# Altium PCB iMX6 Rex Development Baseboard V1I1_PCB.PcbDoc (part 1 of 6)
Units mm, origin at the board's own origin, x right, y up, seen from the top; angles counter-clockwise.
Board outline 135 x 110 mm, 6 copper layers (L1, L2, L3, L4 (PWR), L5, L6), stack 1.542 mm thick; 580 components, 458 nets, 2100 pads, 1201 vias.
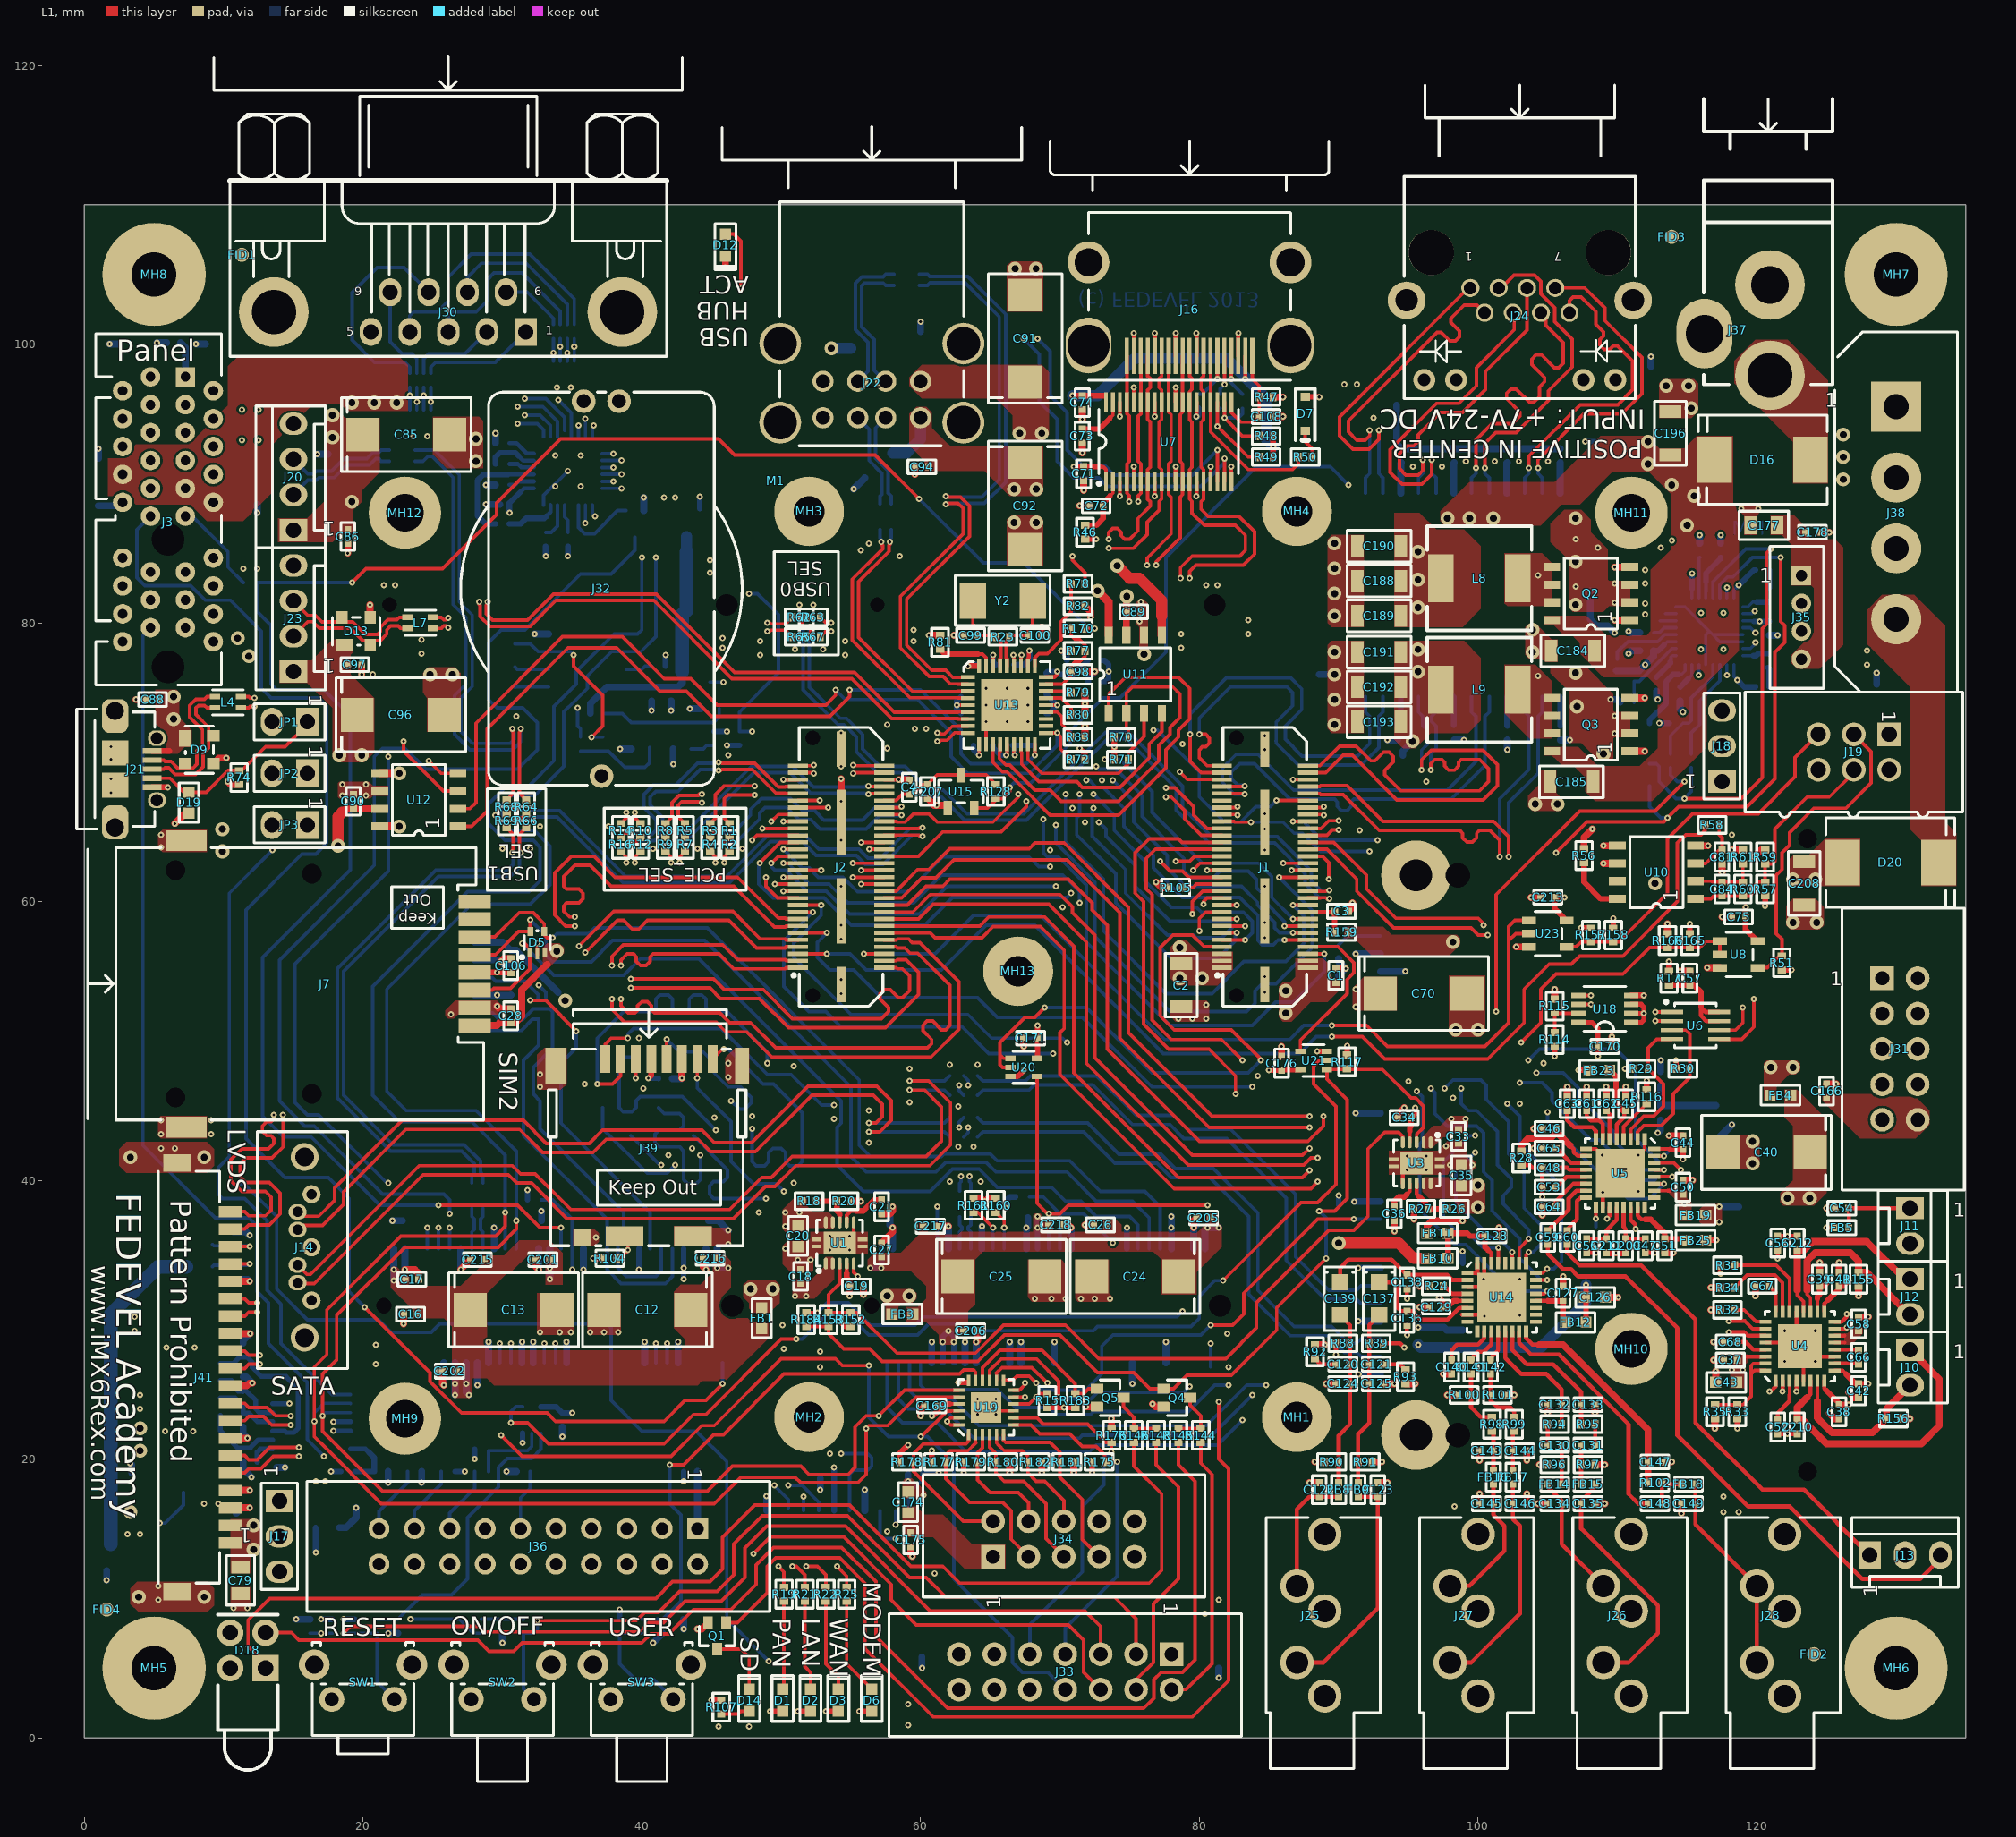
[diagram p0: L1 view]
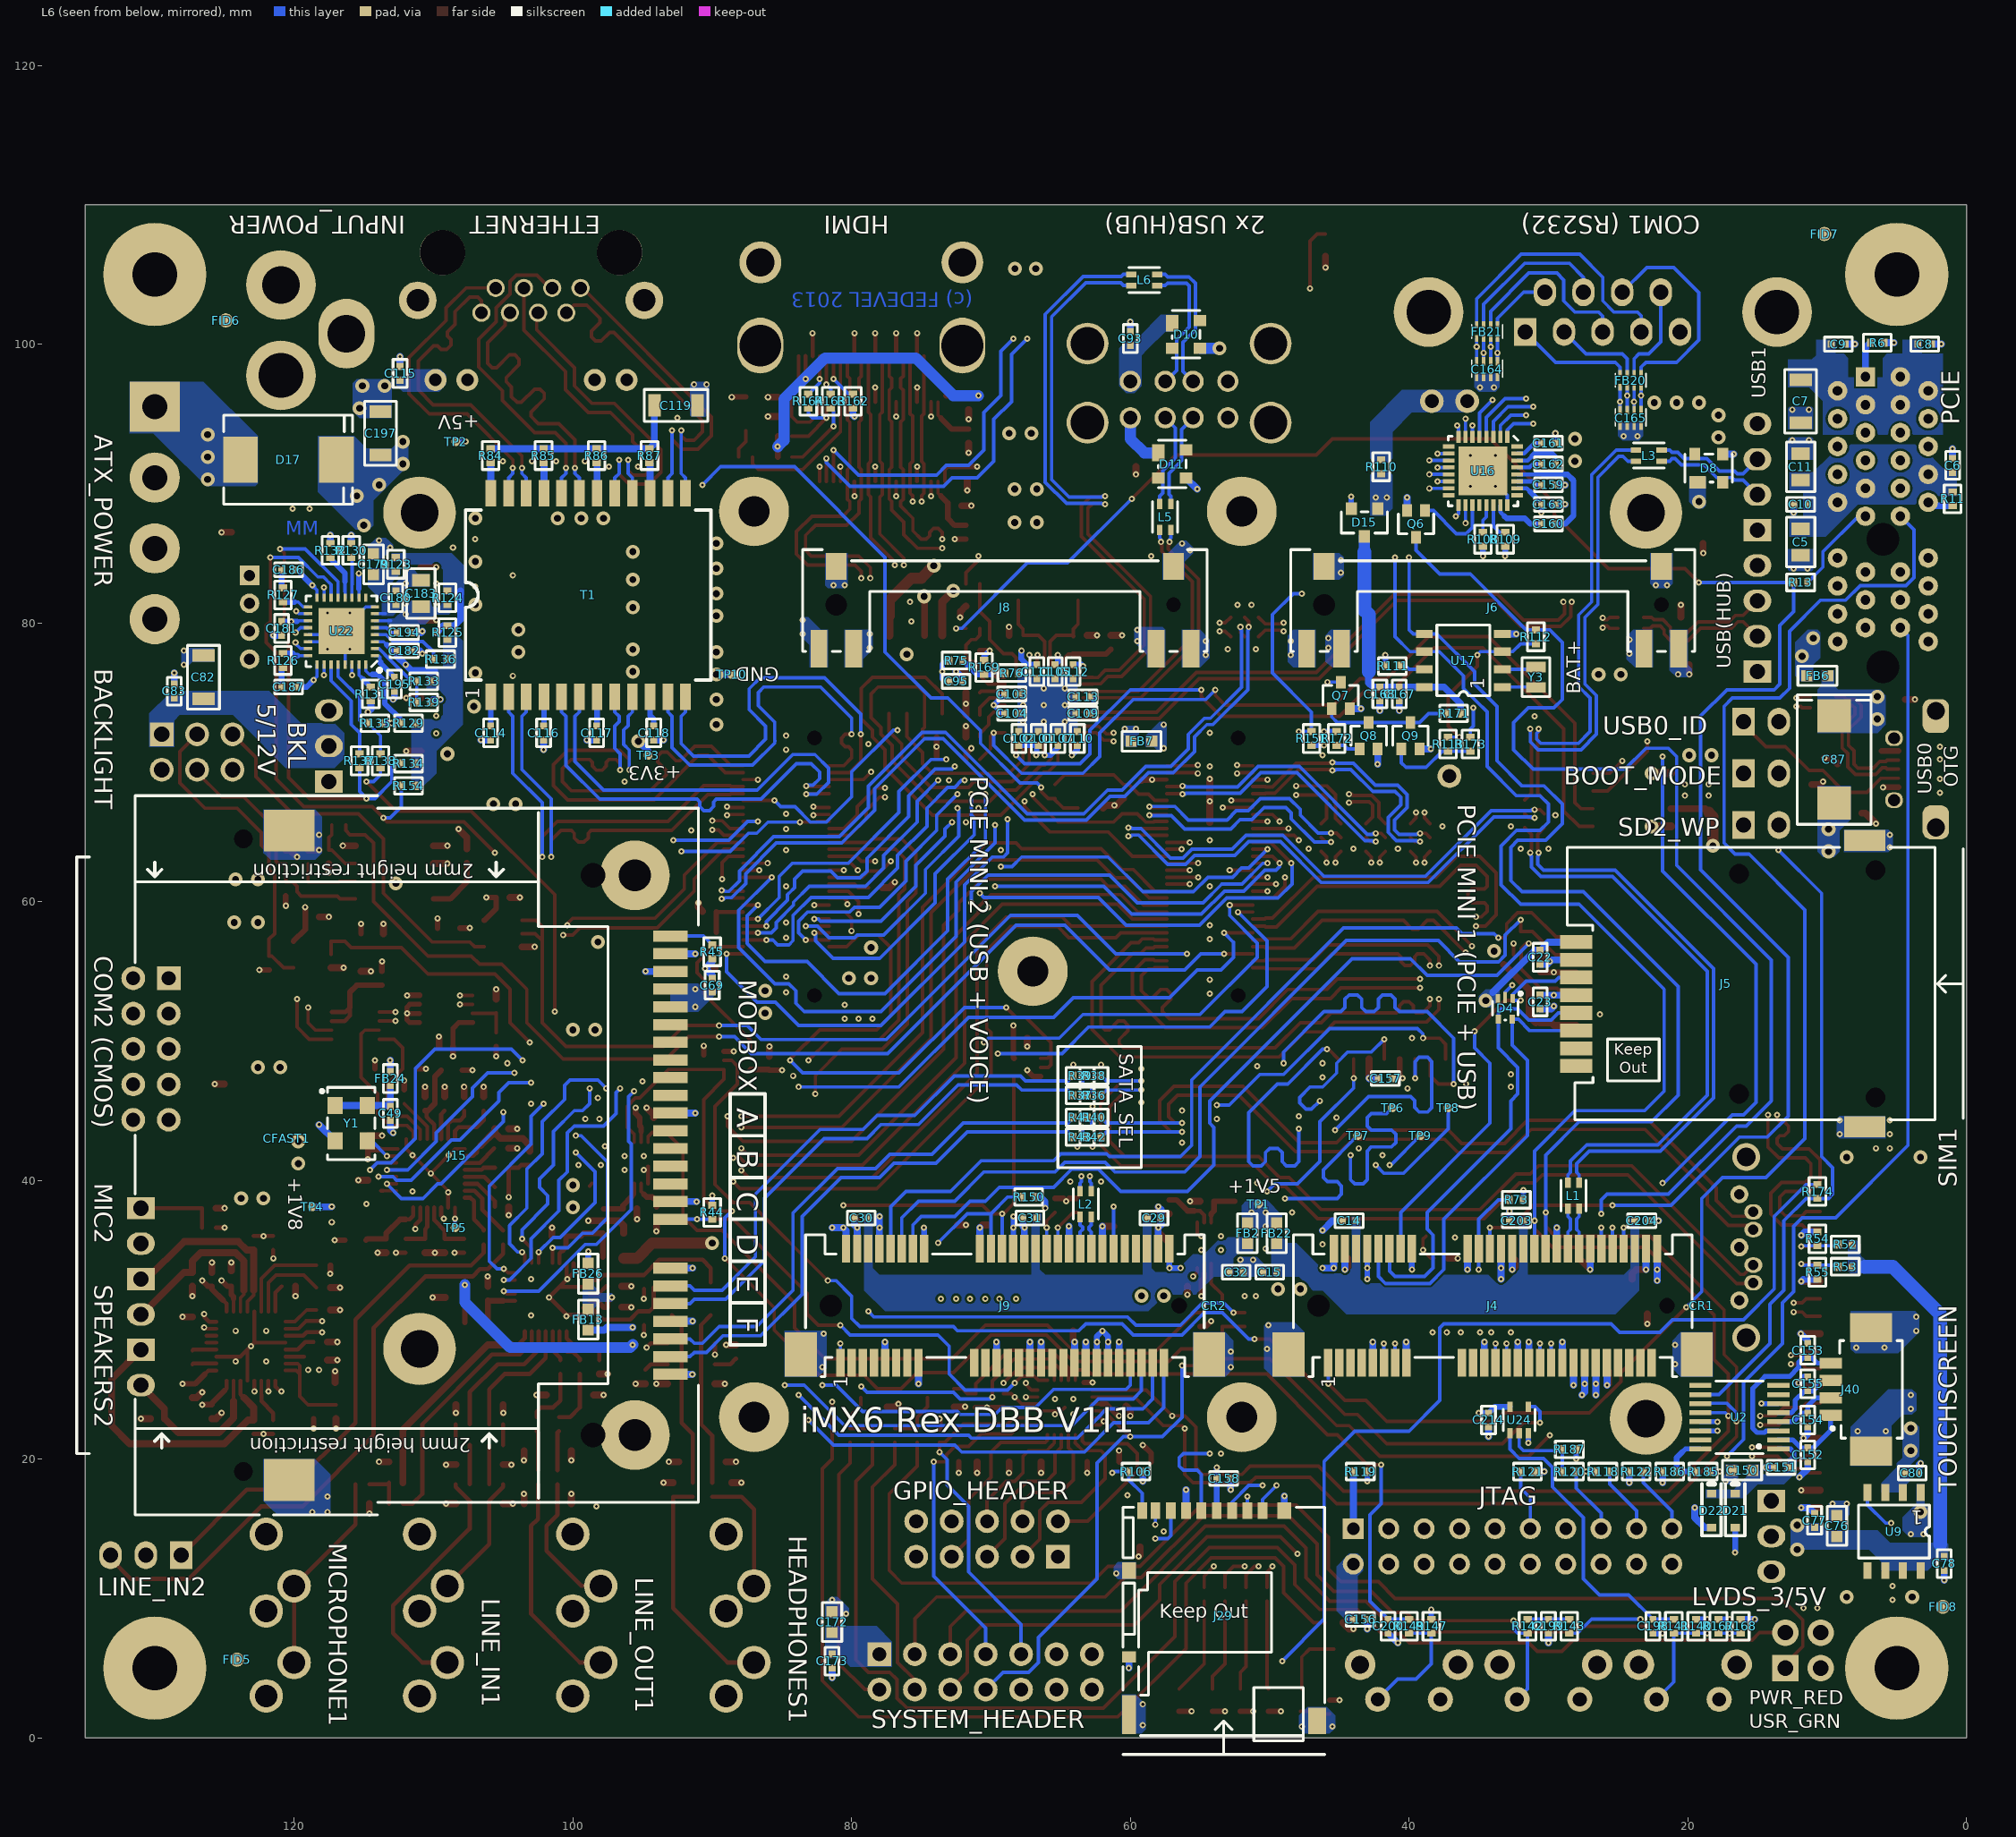
[diagram p1: L6 view, seen from below]
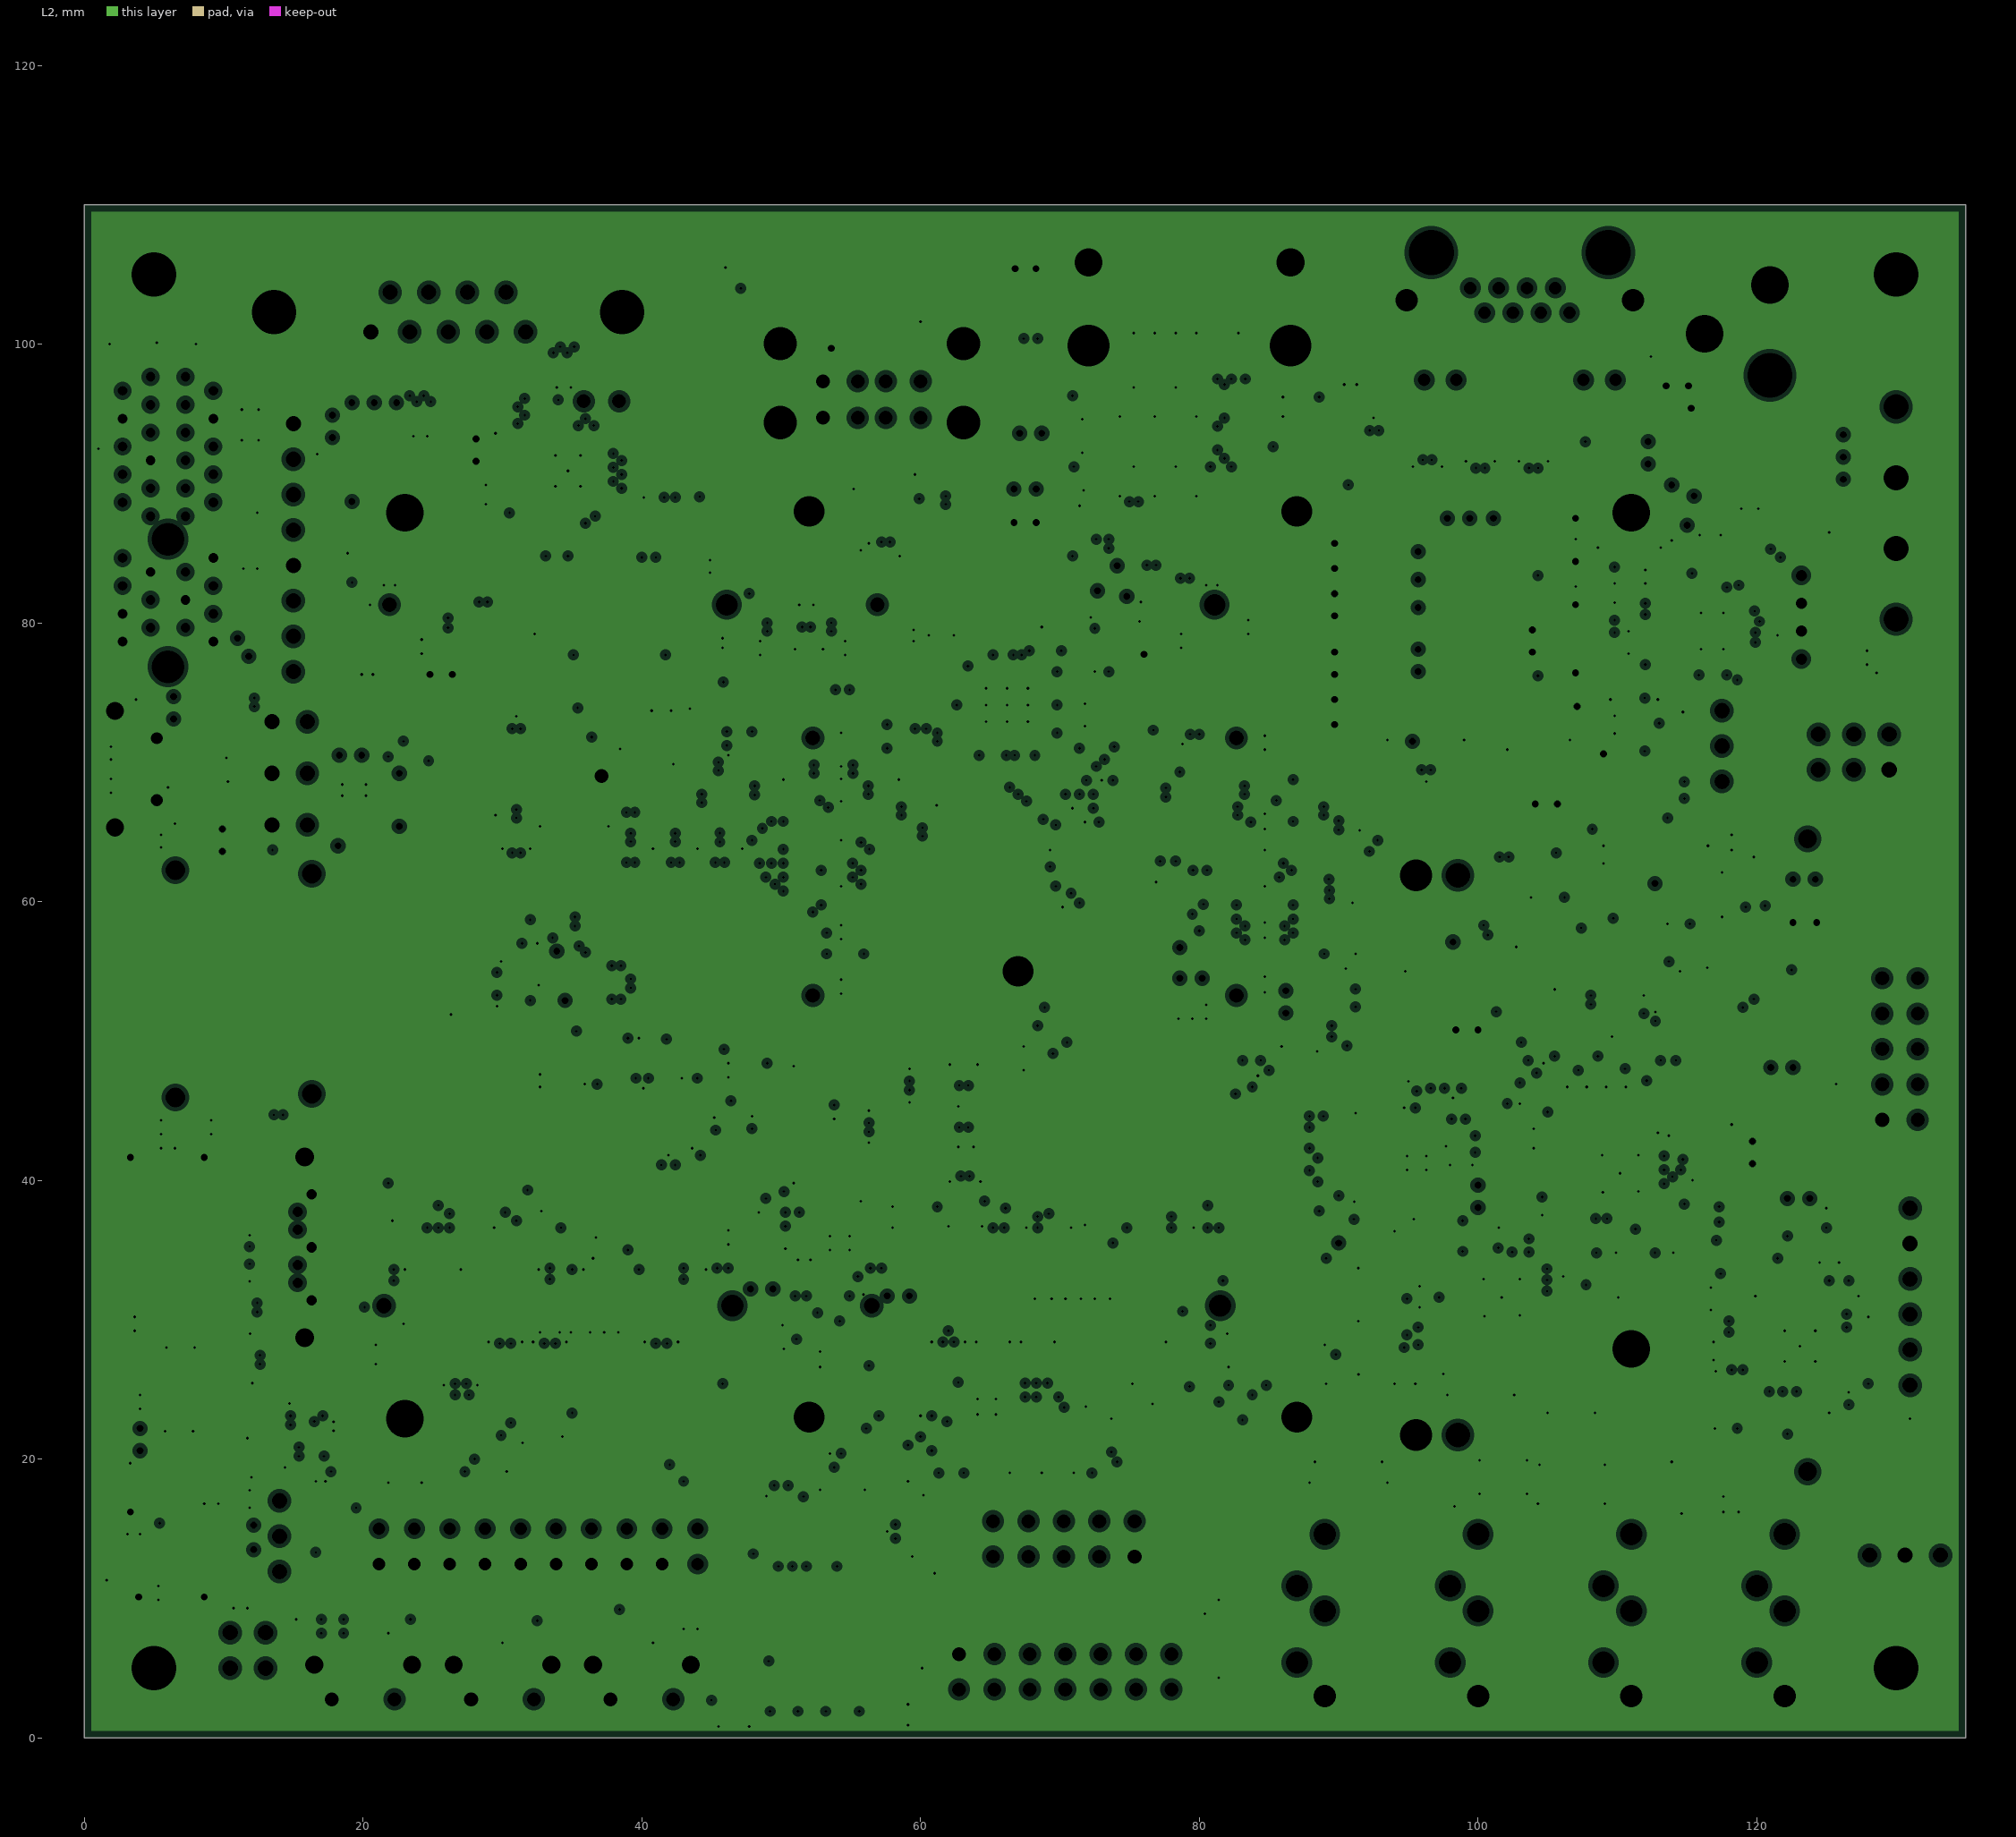
[diagram p2: L2, clearances drawn from the general rule]
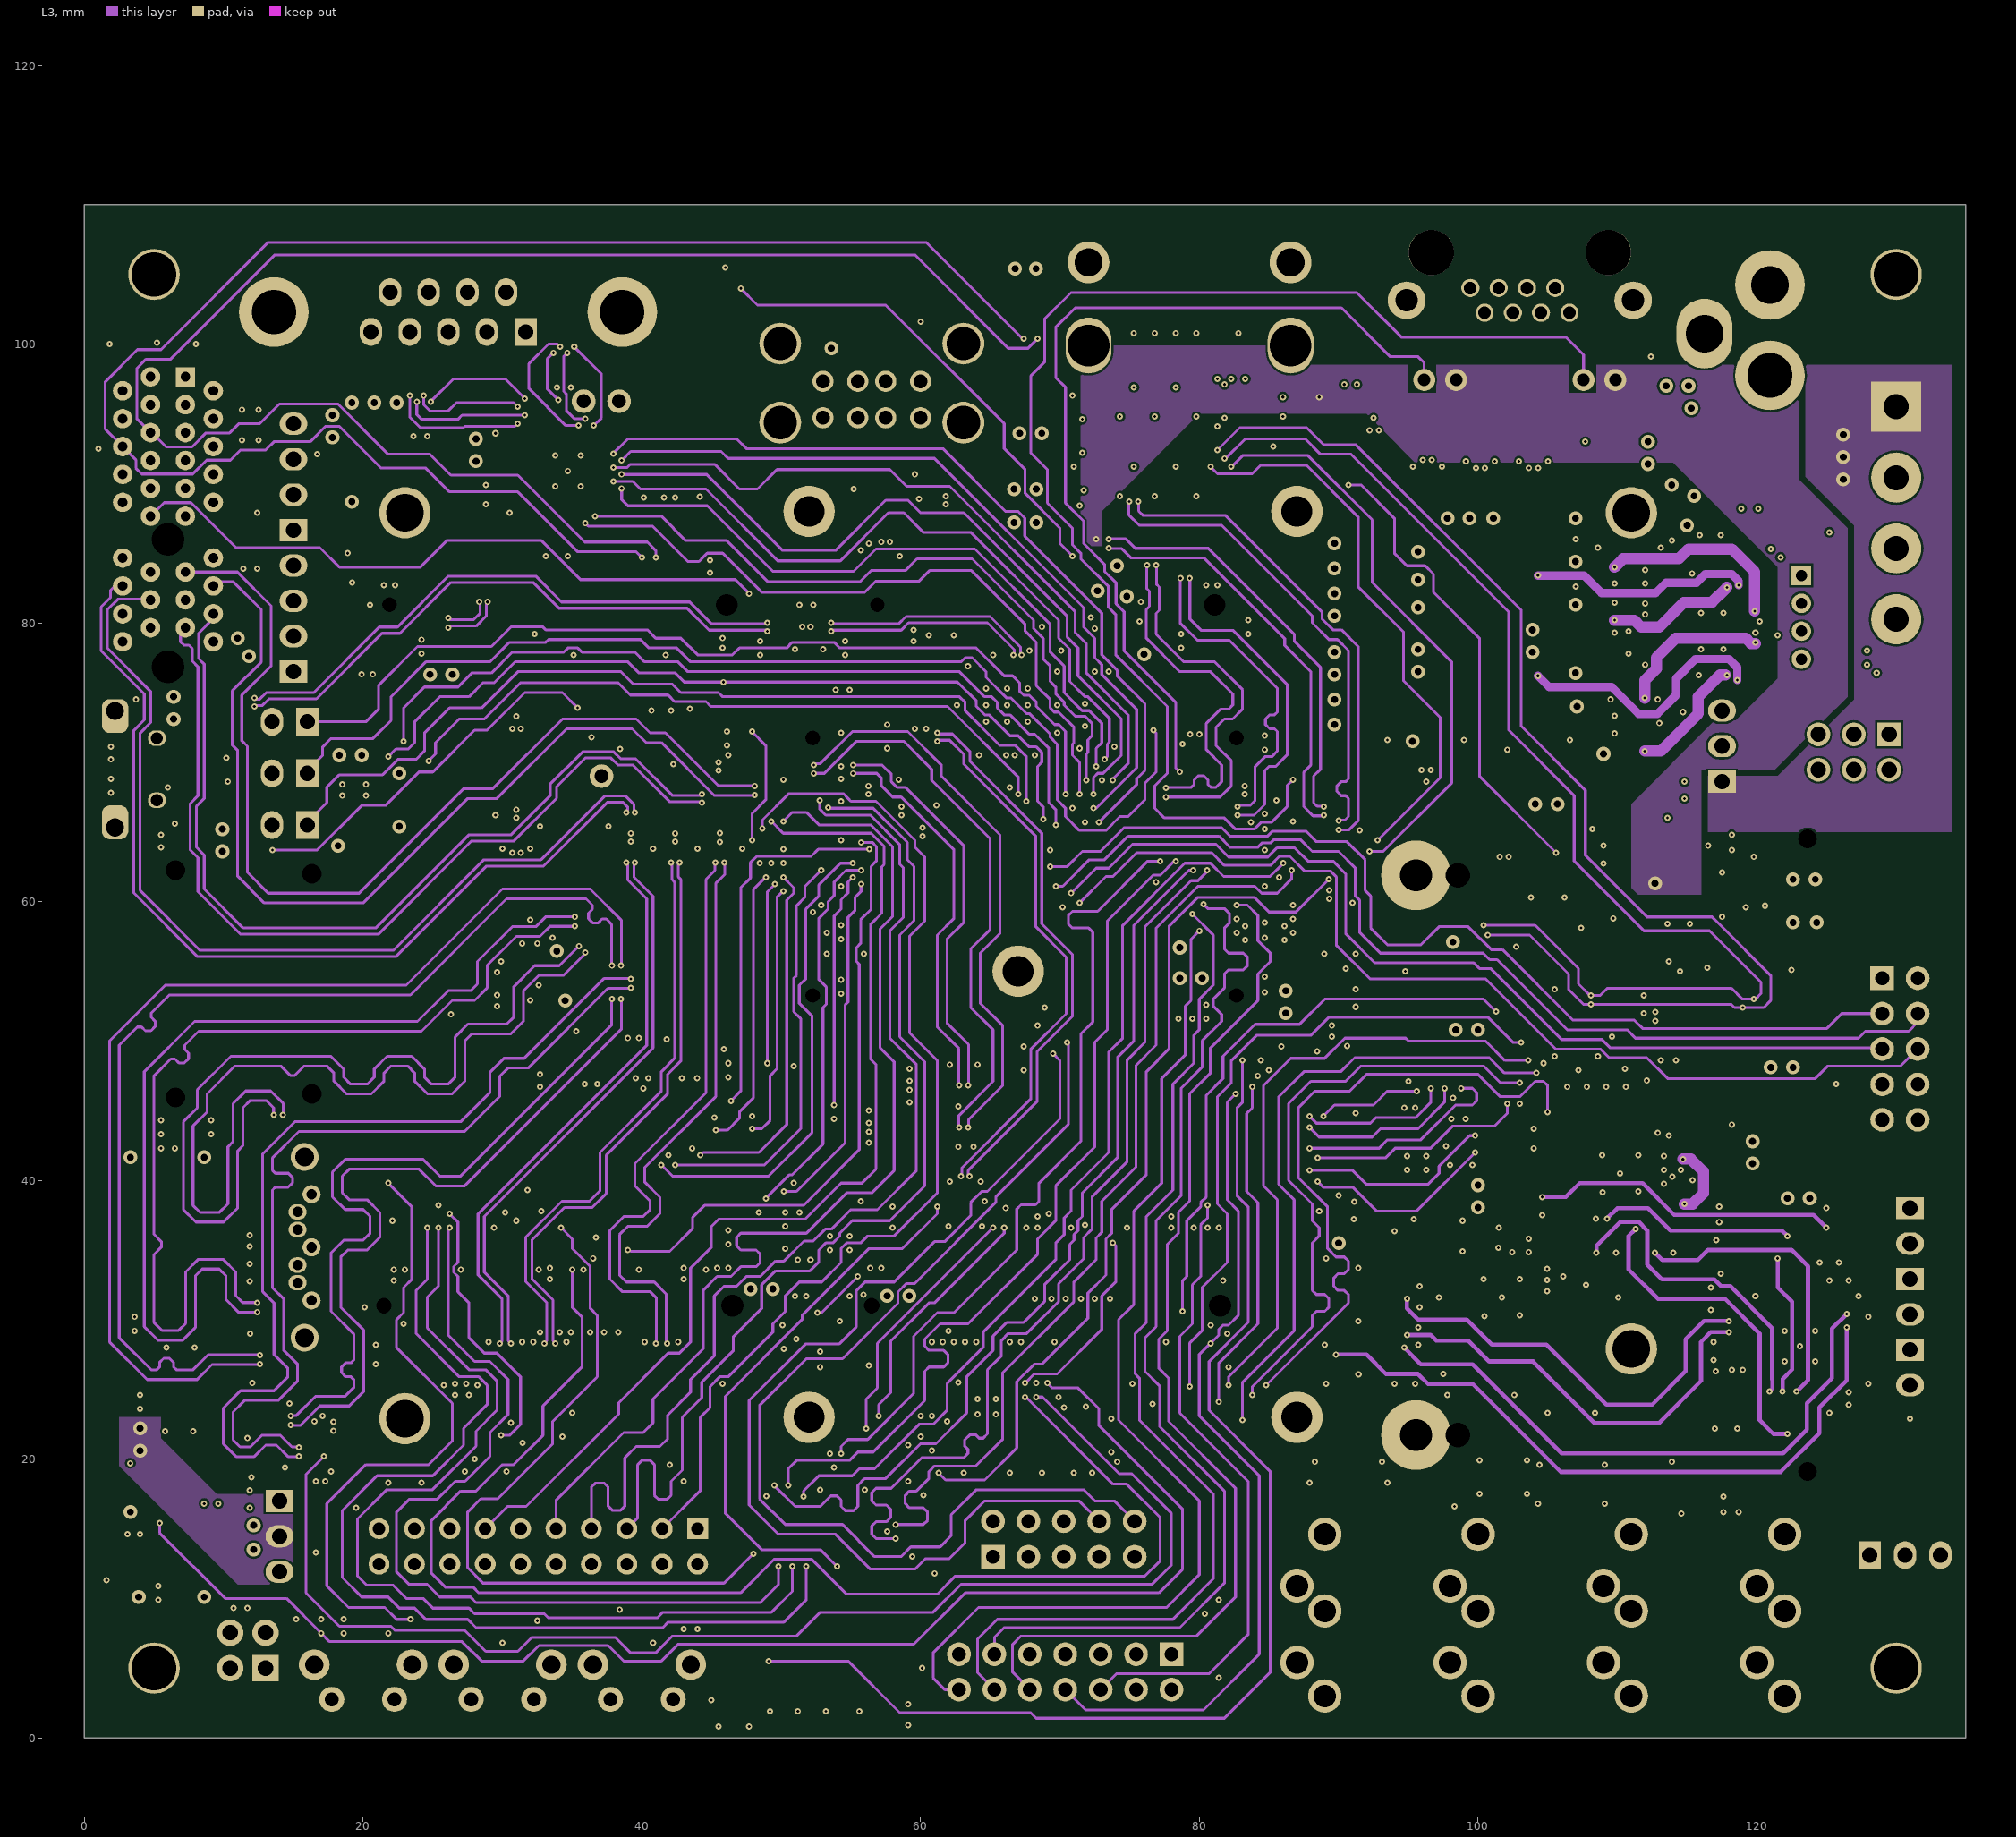
[diagram p3: L3]
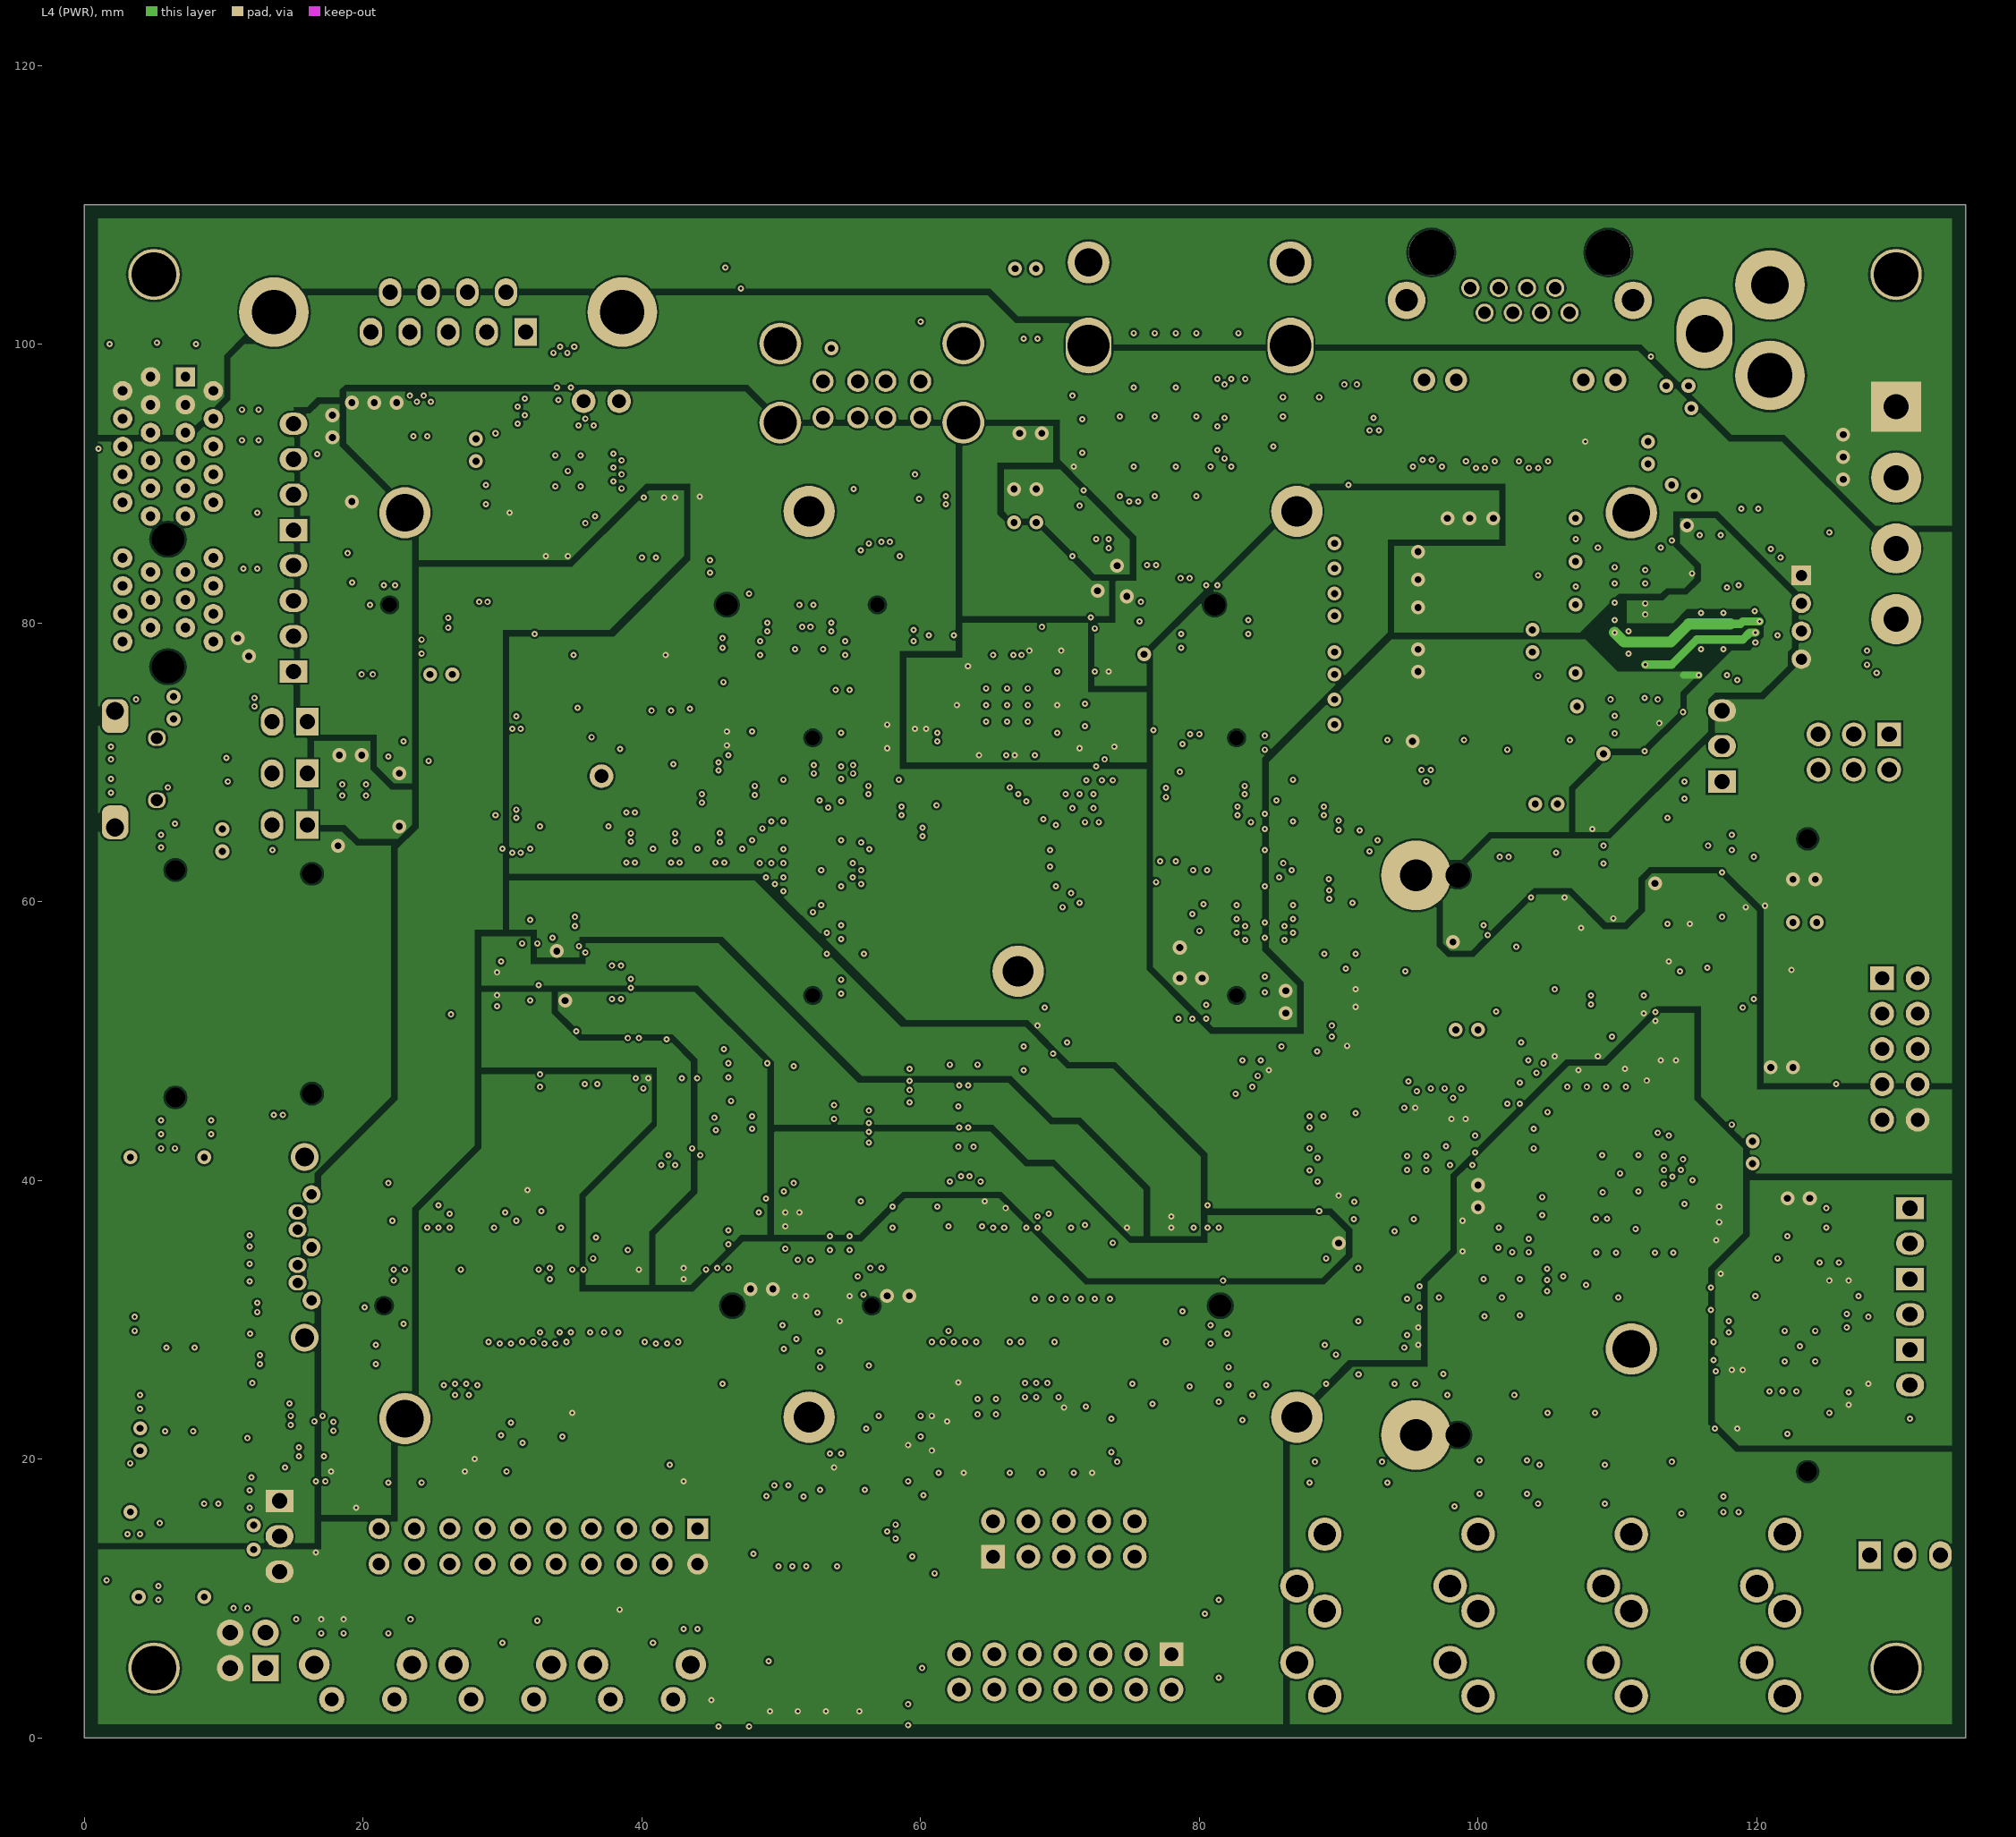
[diagram p4: L4 (PWR)]
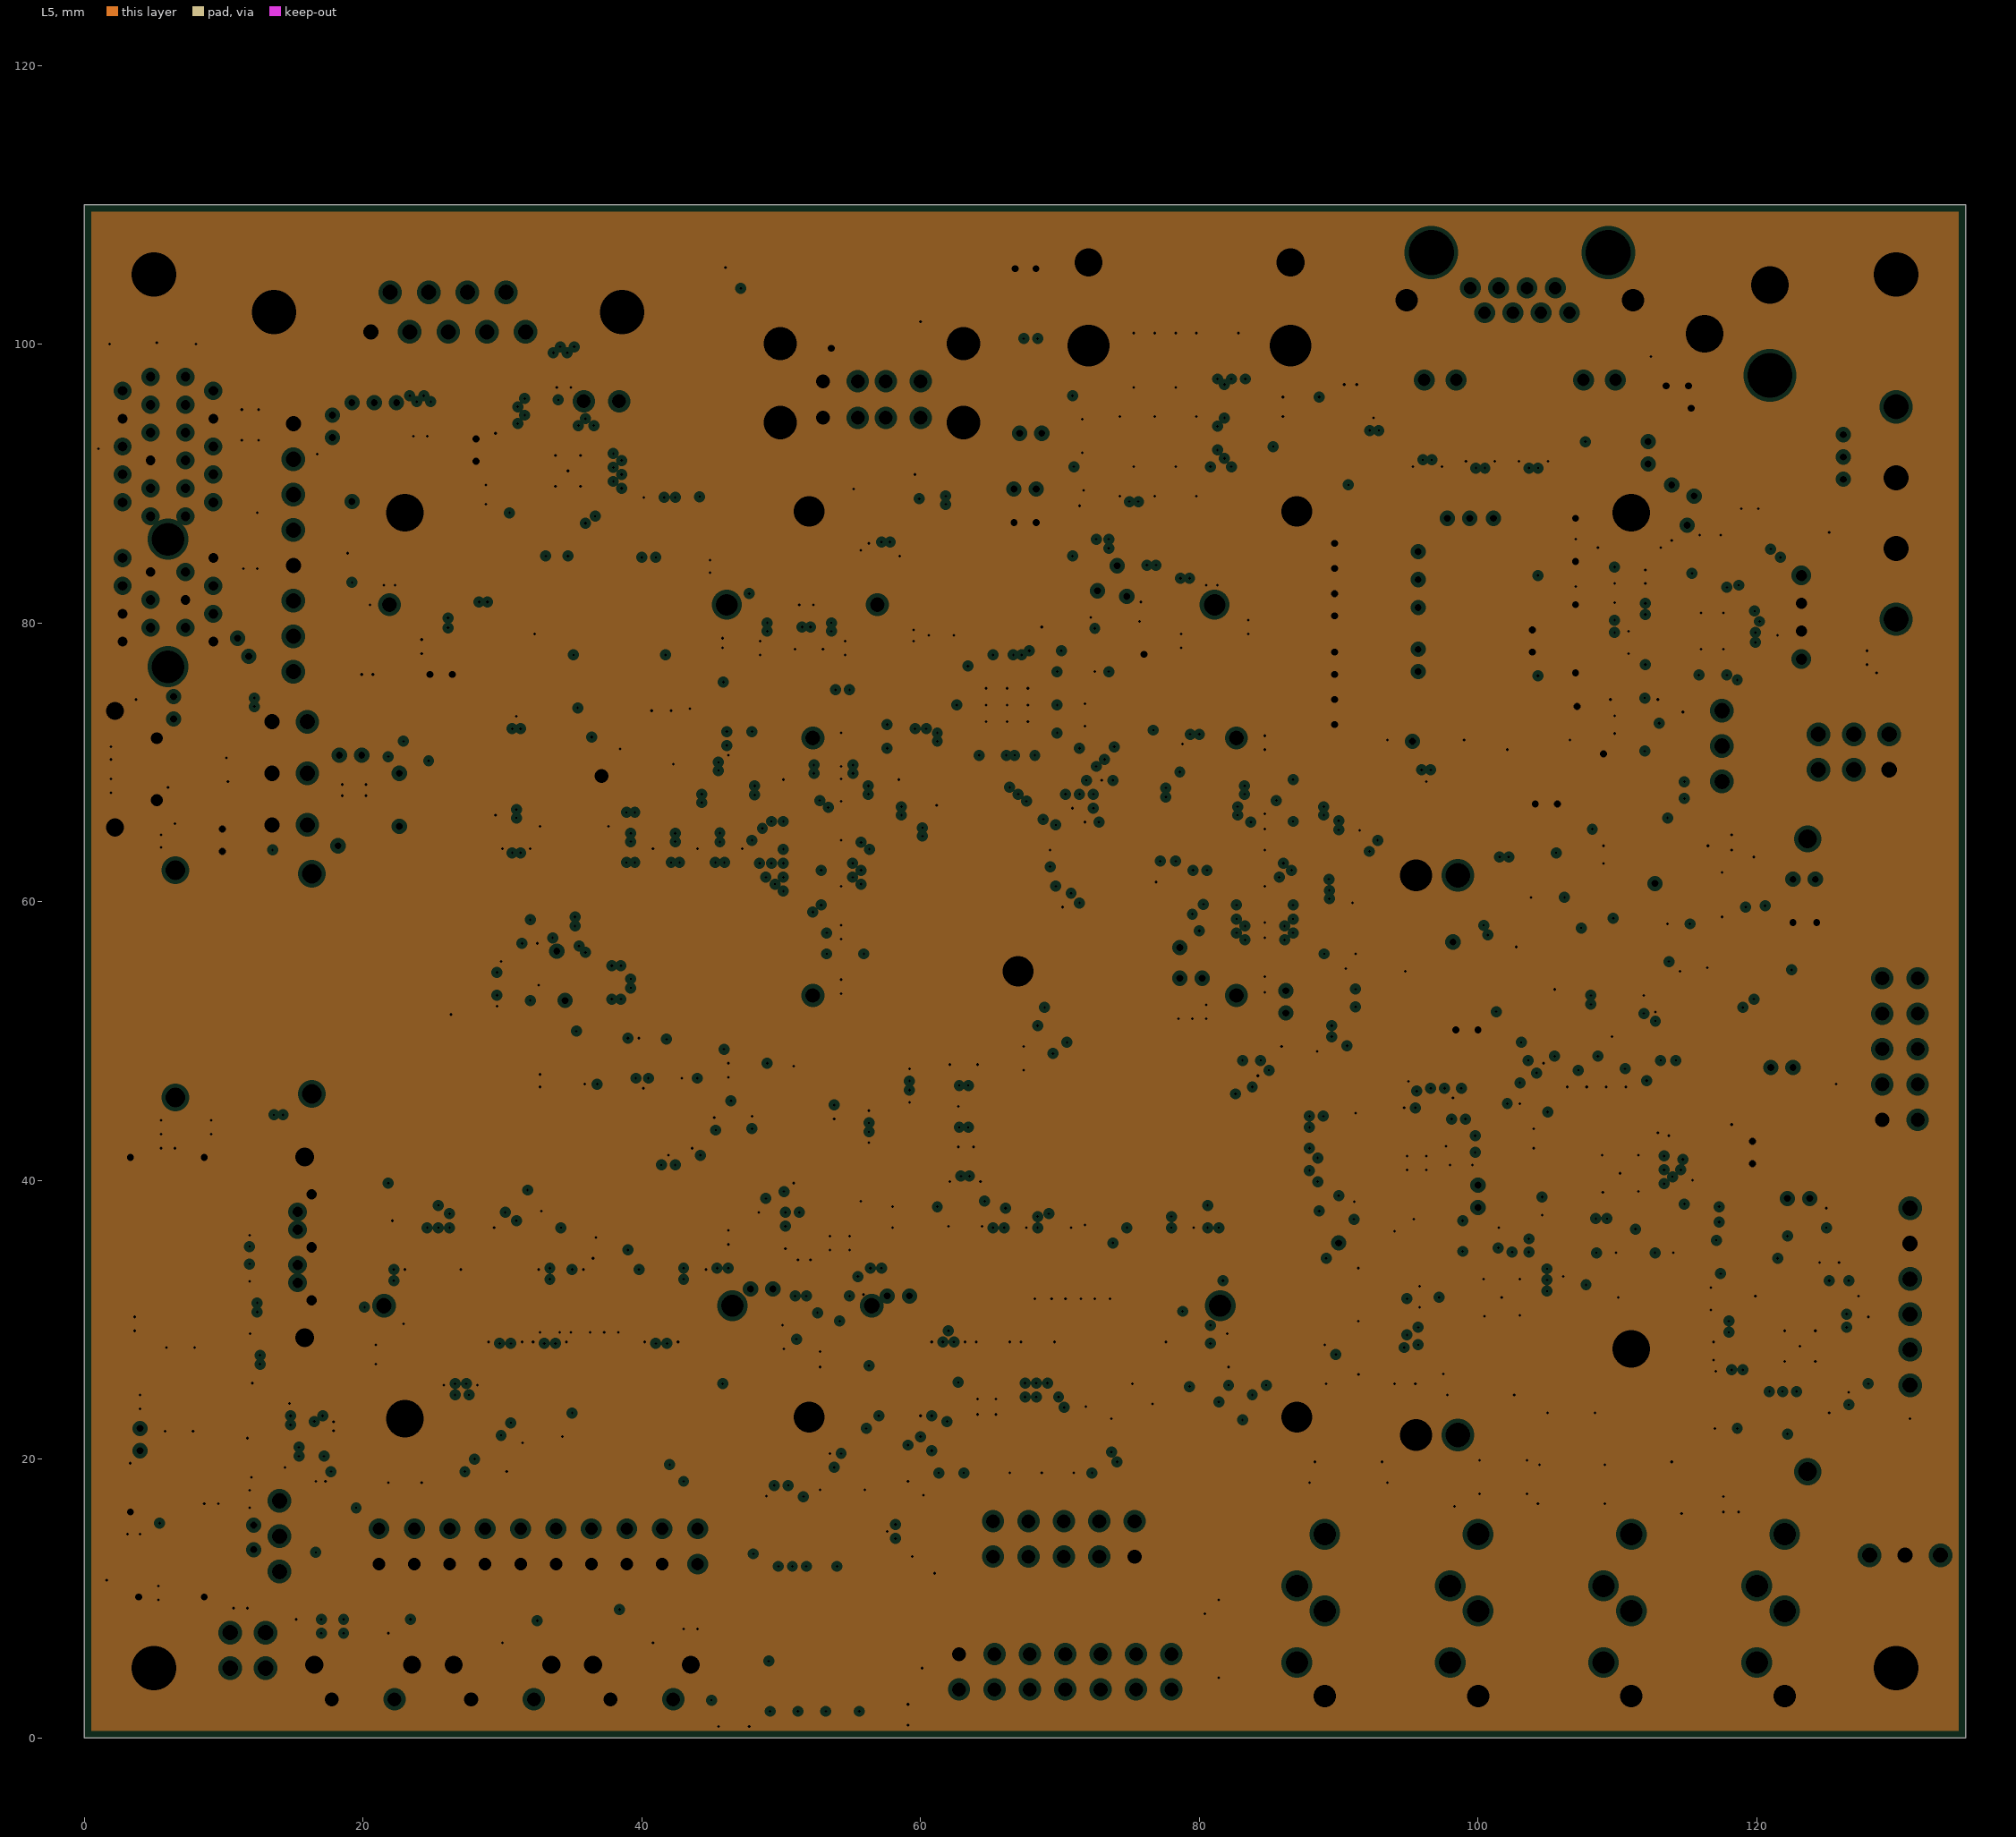
[diagram p5: L5, clearances drawn from the general rule]

## Layer stack, top to bottom
Top Solder: solder mask 0.0102, Solder Resist, Dk 3.5
L1: signal copper 0.018
Dielectric1: core 0.1725, DE 104 ML, Dk 4.4
L2: plane copper 0.018, net GND
Dielectric4: prepreg 0.196, DE 104 ML, Dk 4.4
L3: signal copper 0.018
Dielectric2: core 0.697, DE 104 ML, Dk 4.4
L4 (PWR): signal copper 0.018
Dielectric3: prepreg 0.196, DE 104 ML, Dk 4.4
L5: plane copper 0.018, net GND
Dielectric5: core 0.1725, DE 104 ML, Dk 4.4
L6: signal copper 0.018
Bottom Solder: solder mask 0.0102, Solder Resist, Dk 3.5

## Board outline
0,110 0,0 135,0 135,110 0,110

## Design rules (kind name [scope] priority, off if disabled: settings)
Clearance "Poly PWR to Via" [IsRegion AND OnLayer('L4 (PWR)') vs IsVia] p1: gap=0.15
Clearance "Poly to Poly" [IsRegion AND OnLayer('L4 (PWR)') vs IsRegion] p2: gap=0.4
Clearance [All] p3: gap=0.15
ComponentClearance "MH5 to FID4" [All] p1: gap=0 collisioncheckmode=3 verticalgap=0 showdistances=FALSE
ComponentClearance "DB9 to FID1" [InComponent('J30') vs InComponent('FID1')] p2: gap=0 collisioncheckmode=3 verticalgap=0 showdistances=FALSE
ComponentClearance "3D model Module" [InComponent('M1') vs InComponent('J1') or InComponent('J2')] p3: gap=0 collisioncheckmode=3 verticalgap=0 showdistances=FALSE
ComponentClearance "3D model mPCIe 1 to Battery" [InComponent('CR1') vs InComponent('J32')] p4: gap=0 collisioncheckmode=3 verticalgap=0 showdistances=FALSE
ComponentClearance "CFAST locker" [InComponent('CFAST1') vs InComponent('J15')] p5: gap=0 collisioncheckmode=3 verticalgap=0 showdistances=FALSE
ComponentClearance "3D model mPCIe 2" [InComponent('CR2') vs InComponent('J9') or InComponent('J8')] p6: gap=0 collisioncheckmode=3 verticalgap=0 showdistances=FALSE
ComponentClearance "3D model mPCIe 1" [InComponent('CR1') vs InComponent('J4') or InComponent('J6')] p7: gap=0 collisioncheckmode=3 verticalgap=0 showdistances=FALSE
ComponentClearance "res SATA_TX_P" [InComponent('R42') vs InComponent('R43')] p8: gap=0 collisioncheckmode=3 verticalgap=0.254 showdistances=FALSE
ComponentClearance "res SATA_TX_N" [InComponent('R40') vs InComponent('R41')] p9: gap=0 collisioncheckmode=3 verticalgap=0.254 showdistances=FALSE
ComponentClearance "res SATA_RX_P" [InComponent('R38') vs InComponent('R39')] p10: gap=0 collisioncheckmode=3 verticalgap=0.254 showdistances=FALSE
ComponentClearance "res SATA_RX_N" [InComponent('R36') vs InComponent('R37')] p11: gap=0 collisioncheckmode=3 verticalgap=0.254 showdistances=FALSE
ComponentClearance "res USB1_P" [InComponent('R68') vs InComponent('R69')] p12: gap=0 collisioncheckmode=3 verticalgap=0.254 showdistances=FALSE
ComponentClearance "res USB1_N" [InComponent('R64') vs InComponent('R66')] p13: gap=0 collisioncheckmode=3 verticalgap=0.254 showdistances=FALSE
ComponentClearance "res USB0_P" [InComponent('R65') vs InComponent('R67')] p14: gap=0 collisioncheckmode=3 verticalgap=0.254 showdistances=FALSE
ComponentClearance "res USB0_N" [InComponent('R62') vs InComponent('R63')] p15: gap=0 collisioncheckmode=3 verticalgap=0.254 showdistances=FALSE
ComponentClearance "res PCIE_TX_P" [InComponent('R14') vs InComponent('R16')] p16: gap=0 collisioncheckmode=3 verticalgap=0.254 showdistances=FALSE
ComponentClearance "res PCIE_TX_N" [InComponent('R10') vs InComponent('R12')] p17: gap=0 collisioncheckmode=3 verticalgap=0.254 showdistances=FALSE
ComponentClearance "res PCIE_RX_P" [InComponent('R8') vs InComponent('R9')] p18: gap=0 collisioncheckmode=3 verticalgap=0.254 showdistances=FALSE
ComponentClearance "res PCIE_RX_N" [InComponent('R5') vs InComponent('R7')] p19: gap=0 collisioncheckmode=3 verticalgap=0.254 showdistances=FALSE
ComponentClearance "res CLK_P" [InComponent('R3') vs InComponent('R4')] p20: gap=0 collisioncheckmode=3 verticalgap=0.254 showdistances=FALSE
ComponentClearance "res CLK_N" [InComponent('R2') vs InComponent('R1')] p21: gap=0 collisioncheckmode=3 verticalgap=0.254 showdistances=FALSE
ComponentClearance [All] p22: gap=0.2 collisioncheckmode=3 verticalgap=0.2 showdistances=FALSE
DiffPairsRouting DiffPair_DIFF100DiffPairsRouting [InDifferentialPairClass('DIFF100')] p1: maxlimit=0.501 minlimit=0.399 mostfreqgap=0.5 toplayer_maxgap=0.401 toplayer_prefgap=0.4 toplayer_minwidth=0.25 toplayer_maxwidth=0.25 toplayer_prefwidth=0.25 midlayer1_mingap=0.499 midlayer1_minwidth=0.2 midlayer1_maxwidth=0.2 midlayer1_prefwidth=0.2 midlayer2_mingap=0.4 midlayer2_maxgap=0.4 midlayer2_prefgap=0.4 midlayer2_minwidth=0.25 midlayer2_maxwidth=0.25 midlayer2_prefwidth=0.25 bottomlayer_maxgap=0.401 bottomlayer_prefgap=0.4 bottomlayer_minwidth=0.25 bottomlayer_maxwidth=0.25 bottomlayer_prefwidth=0.25 maxuncoupledlength=0
DiffPairsRouting DiffPair_DIFF90DiffPairsRouting [InDifferentialPairClass('DIFF90')] p2: maxlimit=0.251 minlimit=0.199 mostfreqgap=0.25 toplayer_maxgap=0.201 toplayer_prefgap=0.2 toplayer_minwidth=0.25 toplayer_maxwidth=0.25 toplayer_prefwidth=0.25 midlayer1_mingap=0.249 midlayer1_minwidth=0.2 midlayer1_maxwidth=0.2 midlayer1_prefwidth=0.2 midlayer2_mingap=0.2 midlayer2_maxgap=0.2 midlayer2_prefgap=0.2 midlayer2_minwidth=0.25 midlayer2_maxwidth=0.25 midlayer2_prefwidth=0.25 bottomlayer_maxgap=0.201 bottomlayer_prefgap=0.2 bottomlayer_minwidth=0.25 bottomlayer_maxwidth=0.25 bottomlayer_prefwidth=0.25 maxuncoupledlength=0
DiffPairsRouting [All] p3: maxlimit=0.2 minlimit=0.2 mostfreqgap=0.2 toplayer_minwidth=0.381 toplayer_maxwidth=0.381 toplayer_prefwidth=0.381 midlayer1_minwidth=0.381 midlayer1_maxwidth=0.381 midlayer1_prefwidth=0.381 midlayer2_minwidth=0.381 midlayer2_maxwidth=0.381 midlayer2_prefwidth=0.381 bottomlayer_minwidth=0.381 bottomlayer_maxwidth=0.381 bottomlayer_prefwidth=0.381 maxuncoupledlength=12.7
HoleSize [All] p1: absolutevalues=TRUE maxlimit=10 minlimit=0.2 maxpercent=80.000 minpercent=20.000
MatchedLengths DiffPair_DIFF100MatchedLengths [InDifferentialPairClass('DIFF100')] p1: tolerance=0.127 checknetsindiffpair=TRUE checkdiffpairvsdiffpair=FALSE checkothers=FALSE
MatchedLengths DiffPair_DIFF90MatchedLengths [InDifferentialPairClass('DIFF90')] p2: tolerance=0.127 checknetsindiffpair=TRUE checkdiffpairvsdiffpair=FALSE checkothers=FALSE
MinimumSolderMaskSliver [All] p1: minsoldermaskwidth=0.1
PlaneClearance [All] p1: clearance=0.3
PlaneConnect "GND to PAD" [(InNet('GND') and IsPad)] p1: planeconnectstyle=Relief reliefexpansion=0.3 reliefentries=4 reliefconductorwidth=0.5 reliefairgap=0.2
PlaneConnect [All] p2: planeconnectstyle=Direct reliefexpansion=0.2 reliefentries=4 reliefconductorwidth=0.3 reliefairgap=0.2
PolygonConnect [All] p1: connectstyle=Direct reliefconductorwidth=0.254 reliefentries=4 polygonreliefangle="90 Angle" airgapwidth=0.254
RoutingVias [All] p1: holewidth=0.2 width=0.45 viastyle="Through Hole" minholewidth=0.2 minwidth=0.45 maxholewidth=0.5 maxwidth=1
ShortCircuit "J15-H3 to J15-H4" [(Name = 'J15-H3') vs (Name = 'J15-H4')] p1: allowed=TRUE
ShortCircuit "J15-H1 to J15-H2" [(Name = 'J15-H1') vs (Name = 'J15-H2')] p2: allowed=TRUE
ShortCircuit [All] p3: allowed=FALSE
SilkToSilkClearance [All] p1: silktosilkclearance=0.1
SilkToSolderMaskClearance SilkscreenOverComponentPads [IsPad] p1: minsilkscreentomaskgap=0.1 clearancetoexposedcopper=TRUE
SolderMaskExpansion [All] p1: expansion=0.102
UnpouredPolygon [All] p1: allowunpoured=FALSE
Width DiffPair_DIFF100Width [InDifferentialPairClass('DIFF100')] p1: maxlimit=0.25 minlimit=0.2 preferedwidth=0.25 toplayer_minwidth=0.25 midlayer1_maxwidth=0.2 midlayer1_prefwidth=0.2 midlayer2_minwidth=0.25 bottomlayer_minwidth=0.25 minimp=50.000000 maximp=50.000000 favimp=50.000000
Width DiffPair_DIFF90Width [InDifferentialPairClass('DIFF90')] p2: maxlimit=0.25 minlimit=0.2 preferedwidth=0.25 toplayer_minwidth=0.25 midlayer1_maxwidth=0.2 midlayer1_prefwidth=0.2 midlayer2_minwidth=0.25 bottomlayer_minwidth=0.25 minimp=50.000000 maximp=50.000000 favimp=50.000000
Width "Width Power" [InNet('+VIN') OR InNet('+5V') OR InNet('+3V3') OR InNet('+1V5') OR InNet('+12V_ATX')] p3: maxlimit=4 minlimit=0.2 preferedwidth=0.4
Width "Width Ground" [InNet('GND')] p4: maxlimit=40 minlimit=0.2 preferedwidth=0.4
Width [All] p5: maxlimit=2 minlimit=0.2 preferedwidth=0.25
20 further rules are at their usual default settings.

## Classes and differential pairs
net class MX: MX0_N MX0_P MX1_N MX1_P MX2_N MX2_P MX3_N MX3_P
net class uSD2: SD2_ACT SD2_CD SD2_CLK SD2_CMD SD2_DATA0 SD2_DATA1 SD2_DATA2 SD2_DATA3 SD2_DATA4 SD2_DATA5 SD2_DATA6 SD2_DATA7 SD2_WP
net class uSD1: SD3_CD SD3_CLK SD3_CMD SD3_DATA0 SD3_DATA1 SD3_DATA2 SD3_DATA3 SD3_WP
net class UART2: UART2_CTS UART2_RTS UART2_RXD UART2_TXD
net class JTAG: JTAG_DACK JTAG_DE JTAG_NSRST JTAG_NTRST JTAG_RTCK JTAG_TCK JTAG_TDI JTAG_TDO JTAG_TMS JTAG_VREF
net class Audio1: AUD3_CLK AUD3_RXD AUD3_TXC AUD3_TXD AUD3_TXFS I2C1_SCL I2C1_SDA
component class "[03] - CONNECTORS": C1 C2 C3 C4 J1 J2 MH1 MH2 MH3 MH4 R159 TP6 TP7 TP8 TP9
component class "[04] - PCIE MINI 1, PCIE": C5 C6 C7 C8 C9 C10 C11 C12 C13 C14 C15 C16 C17 C18 C19 C20 C21 C22 C23 C201 C202 C203 C204 C215 C216 CR1 D1 D2 D3 D4 FB1 FB22 J3 J4 J5 J6 L1 R1 R2 R3 R4 R5 R6 R7 R8 R9 R10 R11 R12 R13 R14 R15 R16 R18 R19 R20 R21 R22 R73 R151 R152 R153 R184 TP1 U1
component class "[05] - PCIE MINI 2, AUDIO2": C24 C25 C26 C27 C28 C29 C30 C31 C32 C33 C34 C35 C36 C37 C38 C39 C40 C41 C42 C43 C44 C45 C46 C47 C48 C49 C50 C51 C52 C53 C54 C55 C56 C57 C58 C59 C60 C61 C62 C63 C64 C65 C66 C67 C68 C106 C205 C206 C209 C210 C211 C212 C217 C218 CR2 D5 D6 FB2 FB3 FB4 FB5 FB19 FB23 FB24 FB25 J7 J8 J9 J10 J11 J12 J13 L2 R17 R25 R26 R27 R28 R29 R30 R31 R32 R33 R34 R35 R116 R150 R155 R156 TP4 TP5 U3 U4 U5 U6 Y1
component class "[06] - SATA, CFAST": C69 C70 CFAST1 J14 J15 R36 R37 R38 R39 R40 R41 R42 R43 R44 R45
component class "[07] - HDMI": C71 C72 C73 C74 C108 D7 J16 R46 R47 R48 R49 R50 R162 R163 R164 U7
component class "[08] - LVDS": C75 C76 C77 C78 C79 C80 C81 C82 C83 C84 C213 J17 J18 J19 J41 LINK1 LINK2 R51 R52 R53 R54 R55 R56 R57 R58 R59 R60 R61 R157 R158 R165 R166 R167 R168 U8 U9 U10 U23
component class "[09] - USB": C85 C86 C87 C88 C89 C90 C91 C92 C93 C94 C95 C96 C97 C98 C99 C100 C101 C102 C103 C104 C105 C107 C109 C110 C111 C112 C113 D8 D9 D10 D11 D12 D13 D19 FB6 FB7 J20 J21 J22 J23 JP1 L3 L4 L5 L6 L7 LINK3 R23 R62 R63 R64 R65 R66 R67 R68 R69 R70 R71 R72 R74 R75 R76 R77 R78 R79 R80 R81 R82 R83 R169 R170 U11 U12 U13 Y2
component class "[10] - ETHERNET": C114 C115 C116 C117 C118 C119 J24 R84 R85 R86 R87 T1
component class "[11] - AUDIO1": C120 C121 C122 C123 C124 C125 C126 C127 C128 C129 C130 C131 C132 C133 C134 C135 C136 C137 C138 C139 C140 C141 C142 C143 C144 C145 C146 C147 C148 C149 FB8 FB9 FB10 FB11 FB12 FB13 FB14 FB15 FB16 FB17 FB18 FB26 J25 J26 J27 J28 R24 R88 R89 R90 R91 R92 R93 R94 R95 R96 R97 R98 R99 R100 R101 R102 U14
component class "[12] - SD": C157 C158 D14 J29 J39 JP3 Q1 R104 R105 R106 R107
component class "[13] - UARTS": C159 C160 C161 C162 C163 C164 C165 C166 FB20 FB21 J30 J31 Q6 R108 R109 U16
component class "[14] - RTC, EEPROM, GPIO, TOUCH SCREEN": BAT1 C150 C151 C152 C153 C154 C155 C167 C168 C169 C170 D15 D21 D22 J32 J40 Q7 Q8 Q9 R110 R111 R112 R113 R114 R115 R160 R161 R171 R172 R173 R174 R185 R186 U2 U17 U18 U19 Y3
component class "[15] - MISC, JTAG, HEADERS": C156 C171 C172 C173 C174 C175 C176 C177 C178 C214 J33 J34 J35 J36 JP2 R117 R118 R119 R120 R121 R122 R175 R176 R177 R178 R179 R180 R181 R182 R187 U20 U21 U24
component class "[16] - POWERS 5V, 3V3": C179 C180 C181 C182 C183 C184 C185 C186 C187 C188 C189 C190 C191 C192 C193 C194 C195 C207 L8 L9 Q2 Q3 R123 R124 R125 R126 R127 R128 R129 R130 R131 R132 R133 R134 R135 R136 R137 R138 R139 R154 TP2 TP3 U15 U22
component class "[17] - PWR IN, LEDS, BUTTONS, MECH": C196 C197 C198 C199 C200 C208 D16 D17 D18 D20 FID1 FID2 FID3 FID4 FID5 FID6 FID7 FID8 J37 J38 M1 MH5 MH6 MH7 MH8 MH9 MH10 MH11 MH12 MH13 PCB1 PCB2 Q4 Q5 R140 R141 R142 R143 R144 R145 R146 R147 R148 R149 R183 SW1 SW2 SW3 TP10
net class DIFF90: MPCIE1_RX_N MPCIE1_RX_P MPCIE1_TX_N MPCIE1_TX_P PCIE_CON_RX_N PCIE_CON_RX_P PCIE_CON_TX_N PCIE_CON_TX_P PCIE_RX_N PCIE_RX_P PCIE_TX_N PCIE_TX_P USB0_N USB0_P USB1_CON_N USB1_CON_P USB1_L_N USB1_L_P USB1_N USB1_P USB_MPCIE1_CON_N USB_MPCIE1_CON_P USB_MPCIE1_N USB_MPCIE1_P USB_MPCIE2_CON_N USB_MPCIE2_CON_P USB_MPCIE2_N USB_MPCIE2_P USB_OTG_CON_N USB_OTG_CON_P USB_OTG_N USB_OTG_P USB_UP_N USB_UP_P USBDN1_CON_N USBDN1_CON_P USBDN1_N USBDN1_P USBDN2_CON_N USBDN2_CON_P USBDN2_N USBDN2_P USBDN3_CON_N USBDN3_CON_P USBDN3_N USBDN3_P
net class DIFF100: CLK1_N CLK1_P HDMI_CLK_N HDMI_CLK_P HDMI_D0_N HDMI_D0_P HDMI_D1_N HDMI_D1_P HDMI_D2_N HDMI_D2_P LVDS0_CLK_N LVDS0_CLK_P LVDS0_TX0_N LVDS0_TX0_P LVDS0_TX1_N LVDS0_TX1_P LVDS0_TX2_N LVDS0_TX2_P LVDS0_TX3_N LVDS0_TX3_P MPCIE1_CLK1_N MPCIE1_CLK1_P MX0_N MX0_P MX1_N MX1_P MX2_N MX2_P MX3_N MX3_P PCIE_CON_CLK1_N PCIE_CON_CLK1_P SATA_CFAST_RX_N SATA_CFAST_RX_P SATA_CFAST_TX_N SATA_CFAST_TX_P SATA_CON_RX_N SATA_CON_RX_P SATA_CON_TX_N SATA_CON_TX_P SATA_RX_N SATA_RX_P SATA_TX_N SATA_TX_P TRD0_N TRD0_P TRD1_N TRD1_P TRD2_N TRD2_P TRD3_N TRD3_P
net class HDMI: HDMI_CEC_CON HDMI_CEC_IN HDMI_CLK_N HDMI_CLK_P HDMI_D0_N HDMI_D0_P HDMI_D1_N HDMI_D1_P HDMI_D2_N HDMI_D2_P HDMI_HPD HDMI_HPD_CON HDMI_SCL_CON HDMI_SCL_CON_R HDMI_SDA_CON HDMI_SDA_CON_R I2C2_SCL I2C2_SDA
net class LVDS: LVDS0_CLK_N LVDS0_CLK_P LVDS0_TX0_N LVDS0_TX0_P LVDS0_TX1_N LVDS0_TX1_P LVDS0_TX2_N LVDS0_TX2_P LVDS0_TX3_N LVDS0_TX3_P
net class PCIE: CLK1_N CLK1_P MPCIE1_CLK1_N MPCIE1_CLK1_P MPCIE1_RX_N MPCIE1_RX_P MPCIE1_TX_N MPCIE1_TX_P PCIE_CON_CLK1_N PCIE_CON_CLK1_P PCIE_CON_RX_N PCIE_CON_RX_P PCIE_CON_TX_N PCIE_CON_TX_P PCIE_RX_N PCIE_RX_P PCIE_TX_N PCIE_TX_P
net class PHY: TRD0_N TRD0_P TRD1_N TRD1_P TRD2_N TRD2_P TRD3_N TRD3_P
net class SATA: SATA_CFAST_RX_N SATA_CFAST_RX_P SATA_CFAST_TX_N SATA_CFAST_TX_P SATA_CON_RX_N SATA_CON_RX_P SATA_CON_TX_N SATA_CON_TX_P SATA_RX_N SATA_RX_P SATA_TX_N SATA_TX_P
net class UART1: RS232_CTS_CON RS232_CTS_L RS232_DCD_CON RS232_DCD_L RS232_DSR_CON RS232_DSR_L RS232_DTR_CON RS232_DTR_L RS232_RI_CON RS232_RI_L RS232_RTS_CON RS232_RTS_L RS232_RXD_CON RS232_RXD_L RS232_TXD_CON RS232_TXD_L UART1_CTS UART1_DCD UART1_DSR UART1_DTR UART1_RI UART1_RTS UART1_RXD UART1_TXD
net class USB0: USB0_ID USB0_N USB0_P USB_MPCIE2_CON_N USB_MPCIE2_CON_P USB_MPCIE2_N USB_MPCIE2_P USB_OTG_CON_N USB_OTG_CON_P USB_OTG_N USB_OTG_P USB_UP_N USB_UP_P USBDN1_CON_N USBDN1_CON_P USBDN1_N USBDN1_OC USBDN1_P USBDN1_PWR_EN USBDN2_CON_N USBDN2_CON_P USBDN2_N USBDN2_OC USBDN2_P USBDN2_PWR_EN USBDN3_CON_N USBDN3_CON_P USBDN3_N USBDN3_OC USBDN3_P USBDN3_PWR_EN
net class USB1: USB1_CON_N USB1_CON_P USB1_L_N USB1_L_P USB1_N USB1_P USB_MPCIE1_CON_N USB_MPCIE1_CON_P USB_MPCIE1_N USB_MPCIE1_P
net class Audio2: AUD2_I2C2_SCL AUD2_I2C2_SDA AUD2_IRQ MPCIE2_12M_CLK MPCIE2_PCM_CLK MPCIE2_PCM_RX MPCIE2_PCM_SYNC MPCIE2_PCM_TX
net class I2C2: I2C2_SCL I2C2_SDA
net class SIM1: +MPCIE1_SIM_PWR +MPCIE1_SIM_VPP MPCIE1_SIM_CLK MPCIE1_SIM_DATA MPCIE1_SIM_RST
net class SIM2: +MPCIE2_SIM_PWR +MPCIE2_SIM_VPP MPCIE2_SIM_CLK MPCIE2_SIM_DATA MPCIE2_SIM_RST
net class SPI2: CSPI2_CLK CSPI2_CS0 CSPI2_MISO CSPI2_MOSI
differential pair class DIFF90: MPCIE1_RX MPCIE1_TX PCIE_CON_RX PCIE_CON_TX PCIE_RX PCIE_TX USB0 USB1 USB1_CON USB1_L USB_MPCIE1 USB_MPCIE1_CON USB_MPCIE2 USB_MPCIE2_CON USB_OTG USB_OTG_CON USB_UP USBDN1 USBDN1_CON USBDN2 USBDN2_CON USBDN3 USBDN3_CON
differential pair class DIFF100: CLK1 HDMI_CLK HDMI_D0 HDMI_D1 HDMI_D2 LVDS0_CLK LVDS0_TX0 LVDS0_TX1 LVDS0_TX2 LVDS0_TX3 MPCIE1_CLK1 MX0 MX1 MX2 MX3 PCIE_CON_CLK1 SATA_CFAST_RX SATA_CFAST_TX SATA_CON_RX SATA_CON_TX SATA_RX SATA_TX TRD0 TRD1 TRD2 TRD3
differential pair MX3: +MX0_P -MX0_N
differential pair MX2: +MX2_P -MX2_N
differential pair MX1: +MX1_P -MX1_N
differential pair MX0: +MX3_P -MX3_N
differential pair CLK1: +CLK1_P -CLK1_N
differential pair HDMI_CLK: +HDMI_CLK_P -HDMI_CLK_N
differential pair HDMI_D0: +HDMI_D0_P -HDMI_D0_N
differential pair HDMI_D1: +HDMI_D1_P -HDMI_D1_N
differential pair HDMI_D2: +HDMI_D2_P -HDMI_D2_N
differential pair LVDS0_CLK: +LVDS0_CLK_P -LVDS0_CLK_N
differential pair LVDS0_TX0: +LVDS0_TX0_P -LVDS0_TX0_N
differential pair LVDS0_TX1: +LVDS0_TX1_P -LVDS0_TX1_N
differential pair LVDS0_TX2: +LVDS0_TX2_P -LVDS0_TX2_N
differential pair LVDS0_TX3: +LVDS0_TX3_P -LVDS0_TX3_N
differential pair MPCIE1_CLK1: +MPCIE1_CLK1_P -MPCIE1_CLK1_N
differential pair MPCIE1_RX: +MPCIE1_RX_P -MPCIE1_RX_N
differential pair MPCIE1_TX: +MPCIE1_TX_P -MPCIE1_TX_N
differential pair PCIE_CON_CLK1: +PCIE_CON_CLK1_P -PCIE_CON_CLK1_N
differential pair PCIE_CON_RX: +PCIE_CON_RX_P -PCIE_CON_RX_N
differential pair PCIE_CON_TX: +PCIE_CON_TX_P -PCIE_CON_TX_N
differential pair PCIE_RX: +PCIE_RX_P -PCIE_RX_N
differential pair PCIE_TX: +PCIE_TX_P -PCIE_TX_N
differential pair SATA_CFAST_RX: +SATA_CFAST_RX_P -SATA_CFAST_RX_N
differential pair SATA_CFAST_TX: +SATA_CFAST_TX_P -SATA_CFAST_TX_N
differential pair SATA_CON_RX: +SATA_CON_RX_P -SATA_CON_RX_N
differential pair SATA_CON_TX: +SATA_CON_TX_P -SATA_CON_TX_N
differential pair SATA_RX: +SATA_RX_P -SATA_RX_N
differential pair SATA_TX: +SATA_TX_P -SATA_TX_N
differential pair TRD0: +TRD0_P -TRD0_N
differential pair TRD1: +TRD1_P -TRD1_N
differential pair TRD2: +TRD2_P -TRD2_N
differential pair TRD3: +TRD3_P -TRD3_N
differential pair USB0: +USB0_P -USB0_N
differential pair USB1_CON: +USB1_CON_P -USB1_CON_N
differential pair USB1_L: +USB1_L_P -USB1_L_N
differential pair USB1: +USB1_P -USB1_N
differential pair USB_MPCIE1_CON: +USB_MPCIE1_CON_P -USB_MPCIE1_CON_N
differential pair USB_MPCIE1: +USB_MPCIE1_P -USB_MPCIE1_N
differential pair USB_MPCIE2_CON: +USB_MPCIE2_CON_P -USB_MPCIE2_CON_N
differential pair USB_MPCIE2: +USB_MPCIE2_P -USB_MPCIE2_N
differential pair USB_OTG_CON: +USB_OTG_CON_P -USB_OTG_CON_N
differential pair USB_OTG: +USB_OTG_P -USB_OTG_N
differential pair USB_UP: +USB_UP_P -USB_UP_N
differential pair USBDN1_CON: +USBDN1_CON_P -USBDN1_CON_N
differential pair USBDN1: +USBDN1_P -USBDN1_N
differential pair USBDN2_CON: +USBDN2_CON_P -USBDN2_CON_N
differential pair USBDN2: +USBDN2_P -USBDN2_N
differential pair USBDN3_CON: +USBDN3_CON_P -USBDN3_CON_N
differential pair USBDN3: +USBDN3_P -USBDN3_N

## Components (designator, comment, footprint, x,y, rotation, side; value= is the part's Value field where it differs from the comment)
C1 "100n" C0402 89.8,54.7 r90 top
C2 "10uF" C1206 78.7,54 r270 top
C3 "100n" C0402 90.2,59.3 r0 top
C4 "1u" C0402 59.2,68.2 r90 top
C5 "22u" C0805 11.9,85.8 r270 bottom
C6 "100n" C0402 1,91.3 r90 bottom
C7 "10uF" C1206 11.9,95.9 r270 bottom
C8 "100n" C0402 3,100 r180 bottom
C9 "100n" C0402 9.2,100 r180 bottom
C10 "100n" C0402 11.9,88.5 r0 bottom
C11 "22u" C0805 11.9,91.2 r90 bottom
C12 "330u" C2917 40.4,30.7 r180 top locked
C13 "330u" C2917 30.8,30.7 r0 top locked
C14 "100n" C0402 44.3,37.1 r0 bottom
C15 "4u7" C0402 50,33.4 r0 bottom
C16 "4u7" C0402 23.4,30.4 r180 top
C17 "100n" C0402 23.5,32.9 r0 top
C18 "1u" C0402 51.4,33.1 r90 top
C19 "4u7" C0402 55.4,32.4 r0 top
C20 "10u" C0603 51.2,36 r270 top
C21 "2700pF" C0402 57.2,38.1 r270 top
C22 "100n" C0402 30.6,56 r270 bottom
C23 "100n" C0402 30.6,52.8 r270 bottom
C24 "330u" C2917 75.4,33.1 r180 top locked
C25 "330u" C2917 65.8,33.1 r0 top locked
C26 "4u7" C0402 72.9,36.8 r180 top
C27 "100n" C0402 57.2,35 r90 top
C28 "100n" C0402 30.6,51.8 r90 top
C29 "100n" C0402 58.3,37.3 r180 bottom
C30 "100n" C0402 79.3,37.3 r0 bottom
C31 "100n" C0402 67.2,37.3 r0 bottom
C32 "4u7" C0402 52.4,33.4 r180 bottom
C33 "1u" C0402 98.6,43.15 r270 top
C34 "4u7" C0402 94.7,44.5 r180 top
C35 "10u" C0603 98.8,40.35 r90 top
C36 "2700pF" C0402 94,37.6 r270 top
C37 "1u" C0402 118.1,27.1 r180 top
C38 "1u" C0402 125.9,23.4 r270 top
C39 "1u" C0402 124.5,32.9 r90 top
C40 "330u" C2917 120.7,42 r180 top locked
C41 "1u" C0402 125.9,32.9 r90 top
C42 "1u" C0402 127.3,24.9 r270 top
C43 "10u" C0603 117.8,25.5 r180 top
C44 "1u" C0402 114.7,42.7 r90 top
C45 "1u" C0402 110.6,45.5 r90 top
C46 "1u" C0402 105.1,43.7 r180 top
C47 "470nF" C0402 112,35.3 r270 top
C48 "1u" C0402 105.1,40.9 r180 top
C49 "10n" C0402 113.1,44.8 r270 bottom
C50 "1u" C0402 114.7,39.5 r90 top
C51 "1u" C0402 113.4,35.3 r270 top
C52 "470nF" C0402 121.5,22.3 r90 top
C53 "1u" C0402 105.1,39.5 r180 top
C54 "270pF" C0402 126.1,38 r180 top
C55 "470nF" C0402 107.8,35.3 r270 top
C56 "470nF" C0402 121.5,35.5 r270 top
C57 "100n" C0402 115.2,54.5 r90 top
C58 "1u" C0402 127.3,29.7 r90 top
C59 "1u" C0402 105,35.9 r270 top
C60 "1u" C0402 106.4,35.9 r270 top
C61 "1u" C0402 107.8,45.5 r90 top
C62 "2u2" C0402 109.2,45.5 r90 top
C63 "1u" C0402 106.4,45.5 r90 top
C64 "1u" C0402 105.1,38.1 r0 top
C65 "1u" C0402 105.1,42.3 r0 top
C66 "1u" C0402 127.3,27.3 r270 top
C67 "470nF" C0402 120.4,32.4 r0 top
C68 "1u" C0402 118.1,28.4 r0 top
C69 "100n" C0402 90,54 r90 bottom
C70 "330u" C2917 96.1,53.4 r0 top locked
C71 "100n" C0402 71.7,90.7 r270 top
C72 "100n" C0402 72.6,88.4 r180 top
C73 "100n" C0402 71.6,93.4 r270 top
C74 "100n" C0402 71.6,95.8 r270 top
C75 "100n" C0402 118.7,58.9 r180 top
C76 "10u" C0603 9.3,15.2 r90 bottom
C77 "100n" C0402 10.9,15.6 r90 bottom
C78 "100n" C0402 1.6,12.5 r270 bottom
C79 "22u" C0805 11.2,11.3 r270 top
C80 "100n" C0402 3.9,19 r180 bottom
C81 "1u" C0402 117.5,63.2 r270 top
C82 "10uF" C1206 126.5,76.1 r90 bottom
C83 "100n" C0402 128.6,75.1 r90 bottom
C84 "100n" C0402 117.5,60.9 r270 top
C85 "330u" C2917 23.1,93.5 r0 top locked
C86 "100n" C0402 18.9,86.2 r270 top
C87 "330u" C2917 9.5,70.2 r270 bottom
C88 "100n" C0402 4.9,74.5 r180 top
C89 "100n" C0402 75.3,80.8 r0 top
C90 "100n" C0402 19.3,67.2 r90 top
C91 "330u" C2917 67.5,100.4 r90 top locked
C92 "330u" C2917 67.5,88.4 r270 top locked
C93 "100n" C0402 60,100.4 r90 bottom
C94 "100n" C0402 60.1,91.2 r180 top
C95 "1u" C0402 72.5,75.8 r180 bottom
C96 "330u" C2917 22.7,73.4 r0 top locked
C97 "100n" C0402 19.4,77 r0 top
C98 "100n" C0402 71.3,76.5 r0 top
C99 "18p" C0402 63.6,79.1 r0 top
C100 "18p" C0402 68.2,79.1 r180 top
C101 "100n" C0402 66.6,71.7 r90 bottom
C102 "4u7" C0402 68,71.7 r270 bottom
C103 "100n" C0402 68.5,74.9 r180 bottom
C104 "4u7" C0402 68.5,73.5 r0 bottom
C105 "1u" C0402 65.4,76.5 r270 bottom
C106 "100n" C0402 30.6,55.4 r90 top
C107 "1u" C0402 65.2,71.7 r90 bottom
C108 "100n" C0402 84.8,94.8 r0 top
C109 "100n" C0402 63.4,73.5 r0 bottom
C110 "100n" C0402 63.8,71.7 r90 bottom
C111 "100n" C0402 66.7,76.5 r270 bottom
C112 "100n" C0402 64.1,76.5 r270 bottom
C113 "1u" C0402 63.4,74.7 r180 bottom
C114 "100n" C0402 105.9,72.1 r90 bottom
C115 "100n" C0402 112.4,97.9 r90 bottom
C116 "100n" C0402 102.1,72.1 r90 bottom
C117 "100n" C0402 98.3,72.1 r90 bottom
C118 "100n" C0402 94.2,72.1 r90 bottom
C119 "1000pF, 2kV" C1206 92.6,95.6 r180 bottom
C120 "100n" C0402 90.3,26.8 r180 top
C121 "100n" C0402 92.7,26.8 r0 top
C122 "270pF" C0402 88.6,17.8 r90 top
C123 "270pF" C0402 92.8,17.8 r90 top
C124 "100pF" C0402 90.3,25.4 r180 top
C125 "100pF" C0402 92.7,25.4 r0 top
C126 "10u" C0603 108.4,31.6 r0 top
C127 "100n" C0402 106.1,31.9 r90 top
C128 "100n" C0402 101,36 r0 top
C129 "100n" C0402 97,30.9 r180 top
C130 "1u" C0402 105.5,21 r0 top
C131 "1u" C0402 107.9,21 r180 top
C132 "2700pF" C0402 105.5,23.9 r180 top
C133 "2700pF" C0402 107.9,23.9 r0 top
C134 "270pF" C0402 105.5,16.8 r180 top
C135 "270pF" C0402 107.9,16.8 r0 top
C136 "1u" C0402 94.9,30.1 r270 top
C137 "220u, 4V" "C1206 -  TLN S Case Tantal" 92.9,31.5 r270 top
C138 "1u" C0402 94.9,32.7 r270 top
C139 "220u, 4V" "C1206 -  TLN S Case Tantal" 90.1,31.5 r270 top
C140 "100n" C0402 98.1,26.6 r270 top
C141 "4u7" C0402 99.5,26.6 r270 top
C142 "4u7" C0402 100.9,26.6 r270 top
C143 "2700pF" C0402 100.6,20.6 r0 top
C144 "2700pF" C0402 103,20.6 r180 top
C145 "270pF" C0402 100.6,16.8 r180 top
C146 "270pF" C0402 103,16.8 r0 top
C147 "1u" C0402 112.7,19.8 r0 top
C148 "100n" C0402 112.7,16.8 r0 top
C149 "270pF" C0402 115.1,16.8 r180 top
C150 "10u" C0603 16.1,19.2 r0 bottom
C151 "100n" C0402 13.3,19.4 r0 bottom
C152 "100n" C0402 11.4,20.3 r270 bottom
C153 "100n" C0402 11.4,27.8 r90 bottom
C154 "100n" C0402 11.4,22.8 r270 bottom
C155 "100n" C0402 11.4,25.4 r90 bottom
C156 "100n" C0402 43.5,8.5 r180 bottom
C157 "100n" C0402 41.7,47.3 r0 bottom
C158 "100n" C0402 53.3,18.6 r180 bottom
C159 "1u" C0402 30,89.9 r180 bottom
C160 "220n" C0402 30,87.1 r0 bottom
C161 "1u" C0402 30,92.9 r180 bottom
C162 "1u" C0402 30,91.4 r180 bottom
C163 "100n" C0402 30,88.5 r180 bottom
C164 "4x 220pF" 4X_CAP_CC0805_CKCL44 34.4,98.2 r90 bottom
C165 "4x 220pF" 4X_CAP_CC0805_CKCL44 24.1,94.7 r90 bottom
C166 "100n" C0402 125,46.4 r90 top
C167 "100n" C0402 40.7,74.9 r270 bottom
C168 "1u" C0402 42.1,74.9 r270 bottom
C169 "1u" C0402 60.8,23.8 r0 top
C170 "100n" C0402 109.1,49.6 r180 top
C171 "100n" C0402 67.9,50.2 r180 top
C172 "10u" C0603 81.4,8.3 r90 bottom
C173 "100n" C0402 81.4,5.5 r270 bottom
C174 "10u" C0603 59.1,16.9 r90 top
C175 "100n" C0402 59.3,14.2 r270 top
C176 "100n" C0402 85.9,48.4 r90 top
C177 "22u" C0805 120.5,87 r180 top
C178 "100n" C0402 124,86.5 r0 top
C179 "10u" C0603 114.3,84.2 r90 bottom
C180 "100n" C0402 112.7,81.8 r90 bottom
C181 "1u" C0402 120.9,79.6 r270 bottom
C182 "1u" C0402 112.1,78 r180 bottom
C183 "1uF" C0805 110.9,82.1 r90 bottom
C184 "10uF" C1206 106.8,78 r180 top
C185 "10uF" C1206 106.7,68.6 r180 top
C186 "100n" C0402 120.4,83.8 r0 bottom
C187 "100n" C0402 120.4,75.4 r180 bottom
C188 "100µF" C1206 92.9,83 r180 top locked
C189 "100µF" C1206 92.9,80.5 r180 top locked
C190 "100µF" C1206 92.9,85.5 r180 top locked
C191 "100µF" C1206 92.9,77.9 r180 top locked
C192 "100µF" C1206 92.9,75.4 r180 top locked
C193 "100µF" C1206 92.9,72.9 r180 top locked
C194 "10n" C0402 112.1,79.3 r180 bottom
C195 "100n" C0402 112.8,75.6 r270 bottom
C196 "10uF" C1206 113.8,93.6 r90 top
C197 "10uF" C1206 113.8,93.6 r90 bottom
C198 "100n" C0402 22.5,8 r270 bottom
C199 "100n" C0402 30,8 r270 bottom
C200 "100n" C0402 41.5,8 r270 bottom
C201 "100n" C0402 32.9,34.3 r180 top
C202 "100n" C0402 26.2,26.3 r180 top
C203 "100n" C0402 32.3,37.1 r0 bottom
C204 "100n" C0402 23.3,37.1 r180 bottom
C205 "100n" C0402 80.3,37.3 r180 top
C206 "100n" C0402 63.6,29.2 r0 top
C207 "100n" C0402 60.5,67.9 r270 top
C208 "10uF" C1206 123.4,61.3 r270 top
C209 "1u" C0402 110.6,35.3 r90 top
C210 "4u7" C0402 122.9,22.3 r90 top
C211 "1u" C0402 109.2,35.3 r90 top
C212 "4u7" C0402 122.9,35.5 r270 top
C213 "100n" C0402 105,60.3 r180 top
C214 "100n" C0402 34.3,22.8 r270 bottom
C215 "4u7" C0402 28.2,34.3 r180 top
C216 "100n" C0402 44.9,34.4 r180 top
C217 "4u7" C0402 60.7,36.7 r0 top
C218 "100n" C0402 69.7,36.8 r0 top
CFAST1 "7E50-C016-00" CFAST_LOCKER 120.55,43 r270 bottom locked
CR1 "PCIe Mini Card" "MINI_PCIE_FULL CARD" 19,31 r90 bottom locked
CR2 "PCIe Mini Card" "MINI_PCIE_FULL CARD" 54,31 r90 bottom locked
D1 "Green" LED_0603 50.1,2.7 r270 top
D2 "Green" LED_0603 52.1,2.7 r270 top
D3 "Green" LED_0603 54.1,2.7 r270 top
D4 "BZA956A,115" SOT665 33.1,52.3 r270 bottom
D5 "BZA956A,115" SOT665 32.5,57.1 r90 top
D6 "Green" LED_0603 56.5,2.7 r270 top
D7 "BAT54HT1G" SOD323 87.6,95 r90 top
D8 "BGX50AE6327" SOT143 18.5,91.1 r90 bottom locked
D9 "BGX50AE6327" SOT143 8.25,70.9 r0 top
D10 "BGX50AE6327" SOT143 56,100.7 r180 bottom locked
D11 "BGX50AE6327" SOT143 57,91.4 r180 bottom locked
D12 "Red" LED_0603 46,107.1 r90 top
D13 "BGX50AE6327" SOT143 19.5,79.4 r90 top locked
D14 "Red" LED_0603 47.7,2.7 r270 top
D15 "BAT54C-7-F" SOT-23-3-123 43.2,87.2 r270 bottom
D16 "B560C-13-F" SMC 120.4,91.7 r0 top locked
D17 "B560C-13-F" SMC 120.4,91.7 r0 bottom
D18 "553-0121F" 553-0121F 13,5 r90 top locked
D19 "PGB1010603MR" C0603 7.5,67.1 r270 top
D20 "B560C-13-F" SMC 129.6,62.8 r180 top
D21 "BAT54HT1G" SOD323 16.6,16.3 r270 bottom
D22 "BAT54HT1G" SOD323 18.3,16.3 r270 bottom
FB1 "220R, 2.5A" C0603 48.6,30.1 r270 top
FB2 "220R, 2.5A" C0603 51.6,36.2 r90 bottom
FB3 "220R, 2.5A" C0603 58.7,30.4 r0 top
FB4 "220R, 2.5A" C0603 121.7,46.1 r0 top
FB5 "BLM15AX601SN1D" C0402 126.1,36.6 r0 top
FB6 "MPZ1608S601A 600OHM/1A" C0603 10.7,76.2 r180 bottom
FB7 "MPZ1608S601A 600OHM/1A" C0603 59.2,71.5 r0 bottom
FB8 "BLM15AX601SN1D" C0402 90,17.8 r270 top
FB9 "BLM15AX601SN1D" C0402 91.4,17.8 r270 top
FB10 "MPZ1608S601A 600OHM/1A" C0603 97.1,34.4 r0 top
FB11 "MPZ1608S601A 600OHM/1A" C0603 97.1,36.2 r180 top
FB12 "MPZ1608S601A 600OHM/1A" C0603 107,29.8 r180 top
FB13 "MPZ1608S601A 600OHM/1A" C0603 98.9,30 r270 bottom
FB14 "BLM15AX601SN1D" C0402 105.5,18.2 r180 top
FB15 "BLM15AX601SN1D" C0402 107.9,18.2 r0 top
FB16 "BLM15AX601SN1D" C0402 101.1,18.7 r270 top
FB17 "BLM15AX601SN1D" C0402 102.5,18.7 r270 top
FB18 "BLM15AX601SN1D" C0402 115.1,18.2 r0 top
FB19 "MPZ1608S601A 600OHM/1A" C0603 115.6,37.5 r180 top
FB20 "4x 220R" 4X0402_BLA2A_MURATA 24.1,97.4 r270 bottom
FB21 "4x 220R" 4X0402_BLA2A_MURATA 34.4,100.9 r270 bottom
FB22 "220R, 2.5A" C0603 49.5,36.2 r90 bottom
FB23 "MPZ1608S601A 600OHM/1A" C0603 108.7,47.9 r180 top
FB24 "BLM15AX601SN1D" C0402 113.1,47.3 r270 bottom
FB25 "MPZ1608S601A 600OHM/1A" C0603 115.6,35.7 r0 top
FB26 "MPZ1608S601A 600OHM/1A" C0603 98.9,33.3 r90 bottom
FID1 "FID_1MMC" FID_40X120D 11.3,106.4 r90 top
FID2 "FID_1MMC" FID_40X120D 124.1,6 r180 top
FID3 "FID_1MMC" FID_40X120D 113.9,107.7 r180 top
FID4 "FID_1MMC" FID_40X120D 1.6,9.2 r180 top
FID5 "FID_1MMC" FID_40X120D 124.1,5.6 r90 bottom
FID6 "FID_1MMC" FID_40X120D 124.9,101.7 r90 bottom
FID7 "FID_1MMC" FID_40X120D 10.2,107.9 r90 bottom
FID8 "FID_1MMC" FID_40X120D 1.7,9.4 r90 bottom
J1 "QTH-030-01-L-D-A" QTH-030-01-L-D-A 84.7,62.5 r180 top locked
J2 "QTH-030-01-L-D-A" QTH-030-01-L-D-A 54.3,62.5 r180 top locked
J3 "10018783-10010TLF" MINI_PCIE_36PIN 6,86 r270 top locked
J4 "MM60-52B1-E1-R650" MINI_PCIE_52PIN_CARD_CON 46.5,31 r90 bottom locked
J5 "0475531001" SIM_CARD_PUSH 28,48.2 r180 bottom locked
J6 "MM60-EZH059-B5-R650" MINI_PCIE_52PIN_CARD_LATCH 46.1,81.3 r90 bottom locked
J7 "0475531001" SIM_CARD_PUSH 28,60 r180 top locked
J8 "MM60-EZH059-B5-R650" MINI_PCIE_52PIN_CARD_LATCH 81.1,81.3 r90 bottom locked
J9 "MM60-52B1-E1-R650" MINI_PCIE_52PIN_CARD_CON 81.5,31 r90 bottom locked
J10 "76384-302LF" HDR_1X2_2.54MM_SHDR 131,27.84 r0 top locked
J11 "76384-302LF" HDR_1X2_2.54MM_SHDR 131,38 r0 top locked
J12 "76384-302LF" HDR_1X2_2.54MM_SHDR 131,32.92 r0 top locked
J13 "76384-303LF" HDR_1X3_2.54MM_SHDR_V2 128.1,13.1 r90 top locked
J14 "0471554001" SATA_VERTICAL 16.3,39 r90 top locked
J15 "N7G24-A0B2RB-10-0HT" CFAST10 93,41.8 r0 bottom locked
J16 "47151-0001" HDMI 79.3,102.5 r90 top locked
J17 "HDR 1x3" HDR_1X3_2.54MM 14,17 r0 top locked
J18 "HDR 1x3" HDR_1X3_2.54MM 117.5,68.62 r180 top
J19 "HDR 2X3, BOXED" HDR_2X3_2.54MM_BOXED 129.5,72 r270 top locked
J20 "76384-304LF" HDR_1X4_2.54MM_SHDR 15,86.66 r180 top locked
J21 "USB MICRO AB" USB_MICRO_AB 2.2,69.5 r0 top locked
J22 "5787617-1" USB-2A 56.5,97.2 r0 top locked
J23 "76384-304LF" HDR_1X4_2.54MM_SHDR 15,76.5 r180 top locked
J24 "2-406549-1" RJ45LED 103,102 r90 top locked
J25 "SJ1-3535NG" SJ1-3535NG 89,3 r0 top locked
J26 "SJ1-3535NG-BE" SJ1-3535NG 111,3 r0 top locked
J27 "SJ1-3535NG-GR" SJ1-3535NG 100,3 r0 top locked
J28 "SJ1-3535NG-PI" SJ1-3535NG 122,3 r0 top locked
J29 "DM3AT-SF-PEJM5" USD_DM3AT 50.5,16.3 r270 bottom locked
J30 "1734351-1" DBA9_M_RA 26.1,102.3 r0 top locked
J31 "HDR 2x5, BOXED" HDR_2X5_2.54MM_BOXED 129,54.5 r0 top locked
J32 "BA2032" BA2032 37.1,69 r90 top locked
J33 "HDR 2x7, BOXED" HDR_2X7_2.54MM_BOXED 78,6 r270 top locked
J34 "HDR 2x5, BOXED" HDR_2X5_2.54MM_BOXED 65.2,13 r90 top locked
J35 "Hdr 4x2mm BOXED" HDR_1X4_2MM_SHDR 123.2,83.4 r0 top locked
J36 "5103308-5" HDR_2x10_2.54mm_BOXED 44,15 r0 top locked
J37 "PJ-002AH" POWER_JACK_5.5_2.1MM_NS 118.6,101 r0 top locked
J38 "0015244449" 015244449 130,95.5 r0 top locked
J39 "DM3C-SF" USD_DM3CS 40.5,42.3 r270 top locked
J40 "0532610471" 0532610471 8.3,25 r180 bottom locked
J41 "FI-SE20P-HFE" FI-SE20P-HFE 10.5,14 r180 top locked
JP1 "HDR 1x2" HDR_1X2_2.54MM 16,72.9 r270 top locked
JP2 "HDR 1x2" HDR_1X2_2.54MM 16,69.2 r270 top locked
JP3 "HDR 1x2" HDR_1X2_2.54MM 16,65.5 r270 top locked
L1 "ACM2012-900-2P-T002" ACM2012 28.2,38.9 r90 bottom
L2 "ACM2012-900-2P-T002" ACM2012 63.2,38.3 r90 bottom locked
L3 "ACM2012-900-2P-T002" ACM2012 22.8,92 r180 bottom locked
L4 "ACM2012-900-2P-T002" ACM2012 10.3,74.3 r180 top locked
L5 "ACM2012-900-2P-T002" ACM2012 57.5,87.6 r90 bottom locked
L6 "ACM2012-900-2P-T002" ACM2012 59,104.6 r180 bottom locked
L7 "ACM2012-900-2P-T002" ACM2012 24.1,80 r180 top
L8 "4µ7" IHLP_255MILX270MIL 100.1,83.2 r0 top locked
L9 "4µ7" IHLP_255MILX270MIL 100.1,75.2 r180 top locked
M1 "iMX6 Rex Module V1I1 3D" "IMX6 REX MODULE 3D" 49.6,90.2 r270 top
MH1 "MH_5MMC_2.2MMD" MH_5MMD_2.2MMD 87,23 r0 top locked
MH2 "MH_5MMC_2.2MMD" MH_5MMD_2.2MMD 52,23 r0 top locked
MH3 "MH_5MMC_2.2MMD" MH_5MMD_2.2MMD 52,88 r0 top locked
MH4 "MH_5MMC_2.2MMD" MH_5MMD_2.2MMD 87,88 r0 top locked
MH5 "MH_7.4MMC_3.2MMD" MH_7.4MMD_3.2MMD 5,5 r0 top locked
MH6 "MH_7.4MMC_3.2MMD" MH_7.4MMD_3.2MMD 130,5 r0 top locked
MH7 "MH_7.4MMC_3.2MMD" MH_7.4MMD_3.2MMD 130,105 r0 top locked
MH8 "MH_7.4MMC_3.2MMD" MH_7.4MMD_3.2MMD 5,105 r0 top locked
MH9 "MH_5.2MMC_2.7MMD" MH_5.2MMD_2.7MMD 23,22.9 r0 top locked
MH10 "MH_5.2MMC_2.7MMD" MH_5.2MMD_2.7MMD 111,27.9 r0 top locked
MH11 "MH_5.2MMC_2.7MMD" MH_5.2MMD_2.7MMD 111,87.9 r0 top locked
MH12 "MH_5.2MMC_2.7MMD" MH_5.2MMD_2.7MMD 23,87.9 r0 top locked
MH13 "MH_5MMC_2.2MMD" MH_5MMD_2.2MMD 67,55 r0 top locked
Q1 "2N7002BKW,115" SC70_SOT323 45.4,7.3 r270 top
Q2 "SI4816BDY-T1-GE3" 8_SOIC_3.9MM 108.1,82.1 r180 top locked
Q3 "SI4816BDY-T1-GE3" 8_SOIC_3.9MM 108.1,72.7 r180 top locked
Q4 "2N7002BKW,115" SC70_SOT323 78.4,24.4 r0 top
Q5 "2N7002BKW,115" SC70_SOT323 73.6,24.4 r0 top
Q6 "2N7002BKW,115" SC70_SOT323 39.5,87.1 r270 bottom
Q7 "2N7002BKW,115" SC70_SOT323 44.9,74.8 r90 bottom
Q8 "2N7002BKW,115" SC70_SOT323 42.9,71.9 r90 bottom
Q9 "2N7002BKW,115" SC70_SOT323 39.9,71.9 r90 bottom
R1 "0R" R0402 46.3,65.1 r90 top
R2 "0R" R0402 46.3,64.1 r270 top
R3 "0R" R0402 44.9,65.1 r90 top
R4 "0R" R0402 44.9,64.1 r270 top
R5 "0R" R0402 43.1,65.1 r90 top
R6 "0R" R0402 6.4,100.1 r180 bottom
R7 "0R" R0402 43.1,64.1 r270 top
R8 "0R" R0402 41.7,65.1 r90 top
R9 "0R" R0402 41.7,64.1 r270 top
R10 "0R" R0402 39.9,65.1 r90 top
R11 "0R" R0402 1,88.9 r270 bottom
R12 "0R" R0402 39.9,64.1 r270 top
R13 "0R" R0402 11.9,82.9 r0 bottom
R14 "0R" R0402 38.5,65.1 r90 top
R15 "10k" R0402 69.1,24.2 r270 top
R16 "0R" R0402 38.5,64.1 r270 top
R17 "200k" R0402 113.7,54.5 r90 top
R18 "2k1" R0402 52,38.5 r180 top
R19 "330R" R0402 50.2,10.3 r270 top
R20 "2k4" R0402 54.5,38.5 r180 top
R21 "330R" R0402 51.7,10.3 r270 top
R22 "330R" R0402 53.2,10.3 r270 top
R23 "1M" R0402 65.9,79 r180 top
R24 "0R" R0402 97,32.4 r180 top
R25 "330R" R0402 54.7,10.3 r270 top
R26 "3k" R0402 98.3,37.95 r0 top
R27 "2k4" R0402 95.9,37.95 r0 top
R28 "2k2" R0402 103.1,41.6 r90 top
R29 "2k2" R0402 111.7,48 r180 top
R30 "2k2" R0402 114.7,48 r180 top
R31 "10k" R0402 117.9,33.9 r180 top
R32 "0R" R0402 117.9,30.7 r0 top
R33 "10k" R0402 118.6,23.4 r270 top
R34 "0R" R0402 117.9,32.3 r0 top
R35 "10k" R0402 117,23.4 r90 top
R36 "0R" R0402 62.6,46.1 r180 bottom
R37 "0R" R0402 63.6,46.1 r0 bottom
R38 "0R" R0402 62.6,47.5 r180 bottom
R39 "0R" R0402 63.6,47.5 r0 bottom
R40 "0R" R0402 62.6,44.5 r180 bottom
R41 "0R" R0402 63.6,44.5 r0 bottom
R42 "0R" R0402 62.6,43.1 r180 bottom
R43 "0R" R0402 63.6,43.1 r0 bottom
R44 "100k" R0402 90,37.7 r90 bottom
R45 "1k" R0402 90,56.4 r90 bottom
R46 "0R" R0402 71.8,86.5 r270 top
R47 "15k" R0402 84.8,96.2 r180 top
R48 "4k99" R0402 84.8,93.4 r0 top
R49 "4k99" R0402 84.8,91.9 r0 top
R50 "27k" R0402 87.6,91.9 r180 top
R51 "10k" R0402 121.8,55.6 r270 top
R52 "10k" R0402 8.7,35.4 r180 bottom
R53 "10k" R0402 8.7,33.8 r180 bottom
R54 "10k" R0402 10.7,35.8 r270 bottom
R55 "10k" R0402 10.7,33.4 r90 bottom
R56 "0R" R0402 107.6,63.3 r90 top
R57 "4k99" R0402 120.6,60.9 r270 top
R58 "365R" R0402 116.8,65.5 r180 top
R59 "1k" R0402 120.6,63.2 r270 top
R60 "1k8" R0402 119,60.9 r270 top
R61 "3k3" R0402 119,63.2 r90 top
R62 "0R" R0402 51.3,80.4 r180 top
R63 "0R" R0402 52.3,80.4 r0 top
R64 "0R" R0402 31.7,66.8 r90 top
R65 "0R" R0402 51.3,79 r180 top
R66 "0R" R0402 31.7,65.8 r270 top
R67 "0R" R0402 52.3,79 r0 top
R68 "0R" R0402 30.3,66.8 r90 top
R69 "0R" R0402 30.3,65.8 r270 top
R70 "10k" R0402 74.4,71.8 r180 top
R71 "10k" R0402 74.4,70.2 r180 top
R72 "10k" R0402 71.3,70.2 r0 top
R73 "10k" R0402 32.3,38.6 r180 bottom
R74 "100k" R0402 11.1,68.9 r270 top
R75 "100k" R0402 72.5,77.3 r180 bottom
R76 "100k" R0402 68.5,76.4 r180 bottom
R77 "100k" R0402 71.3,78 r180 top
R78 "1k" R0402 71.3,82.8 r180 top
R79 "100k" R0402 71.3,75 r180 top
R80 "100k" R0402 71.3,73.4 r180 top
R81 "12k" R0402 61.4,78.6 r90 top
R82 "100k" R0402 71.3,81.2 r180 top
R83 "100k" R0402 71.3,71.8 r180 top
R84 "75R" R0402 105.9,92 r90 bottom
R85 "75R" R0402 102.1,92 r90 bottom
R86 "75R" R0402 98.3,92 r90 bottom
R87 "75R" R0402 94.5,92 r90 bottom
R88 "0R" R0402 90.3,28.3 r0 top
R89 "0R" R0402 92.7,28.3 r180 top
R90 "15k" R0402 89.5,19.8 r0 top
R91 "15k" R0402 91.9,19.8 r180 top
R92 "33R" R0402 88.3,27.7 r270 top
R93 "33R" R0402 94.8,25.9 r90 top
R94 "100R" R0402 105.5,22.5 r180 top
R95 "100R" R0402 107.9,22.5 r0 top
R96 "100k" R0402 105.5,19.6 r0 top
R97 "100k" R0402 107.9,19.6 r180 top
R98 "562" R0402 101,22.5 r270 top
R99 "562" R0402 102.6,22.5 r270 top
R100 "47k5" R0402 99,24.6 r0 top
R101 "47k5" R0402 101.4,24.6 r180 top
R102 "2k2" R0402 112.7,18.3 r180 top
R104 "0R" R0402 37.7,34.4 r0 top
R105 "0R" R0402 78.3,61 r0 top
R106 "0R" R0402 59.6,19.1 r0 bottom
R107 "330R" R0402 45.7,2.2 r270 top
R108 "10k" R0402 34.7,86 r270 bottom
R109 "10k" R0402 33.1,86 r270 bottom
R110 "1k" R0402 42,91.2 r270 bottom
R111 "10k" R0402 41.2,76.9 r0 bottom
R112 "0R" R0402 30.9,79 r90 bottom
R113 "0R" R0402 37.2,71.3 r270 bottom
R114 "10k" R0402 105.5,50.1 r270 top
R115 "10k" R0402 105.5,52.5 r90 top
R116 "10k" R0402 112.1,46 r90 top
R117 "10k" R0402 90.6,48.5 r90 top
R118 "10k" R0402 26.1,19.1 r0 bottom
R119 "100R" R0402 43.5,19.1 r180 bottom
R120 "0R" R0402 28.5,19.1 r180 bottom
R121 "10k" R0402 31.5,19.1 r0 bottom
R122 "10k" R0402 23.7,19.1 r180 bottom
R123 "0R" R0402 112.7,84.2 r270 bottom
R124 "0R" R0402 109,81.8 r90 bottom
R125 "10R" R0402 109,79.3 r270 bottom
R126 "1R" R0402 120.8,77.3 r270 bottom
R127 "1R" R0402 120.8,82 r270 bottom
R128 "0R" R0402 65.4,67.9 r270 top
R129 "0R" R0402 111.8,72.8 r180 bottom
R130 "0R" R0402 115.9,85.2 r270 bottom
R131 "200k" R0402 114.5,74.9 r270 bottom
R132 "200k" R0402 117.4,85.2 r270 bottom
R133 "0R" R0402 110.7,75.8 r180 bottom
R134 "10k" R0402 111.8,69.9 r180 bottom
R135 "10k" R0402 114.2,72.8 r180 bottom
R136 "10k" R0402 109.5,77.4 r180 bottom
R137 "0R" R0402 115.3,70.1 r270 bottom
R138 "0R" R0402 113.8,70.1 r90 bottom
R139 "10k" R0402 110.7,74.3 r0 bottom
R140 "10k" R0402 19.4,8 r90 bottom
R141 "33R" R0402 21,8 r270 bottom
R142 "33R" R0402 31.5,8 r270 bottom
R143 "0R" R0402 28.5,8 r270 bottom
R144 "240R" R0402 80.1,21.7 r90 top
R145 "240R" R0402 78.5,21.7 r90 top
R146 "240R" R0402 75.3,21.7 r90 top
R147 "10k" R0402 38.4,8 r90 bottom
R148 "240R" R0402 76.9,21.7 r90 top
R149 "33R" R0402 40,8 r270 bottom
R150 "10k" R0402 67.3,38.8 r180 bottom
R151 "10k" R0402 47,71.7 r270 bottom
R152 "10k" R0402 55,30 r270 top
R153 "0R" R0402 53.4,30 r270 top
R154 "10k" R0402 111.8,68.3 r180 bottom
R155 "0R" R0402 127.3,32.9 r90 top
R156 "0R" R0402 129.8,22.9 r180 top
R157 "10k" R0402 108.1,57.6 r90 top
R158 "10k" R0402 109.7,57.6 r90 top
R159 "0R" R0402 90.2,57.8 r0 top
R160 "4k99" R0402 65.4,38.2 r90 top
R161 "4k99" R0402 63.8,38.2 r90 top
R162 "0R" R0402 79.9,95.9 r270 bottom
R163 "0R" R0402 81.5,95.9 r270 bottom
R164 "0R" R0402 83.1,95.9 r270 bottom
R165 "10k" R0402 115.2,57.2 r90 top
R166 "10k" R0402 113.6,57.2 r270 top
R167 "10k" R0402 17.8,8 r90 bottom
R168 "10k" R0402 16.2,8 r270 bottom
R169 "0R" R0402 70.5,76.8 r90 bottom
R170 "0R" R0402 71.3,79.6 r0 top
R171 "100k" R0402 36.8,73.5 r180 bottom
R172 "10k" R0402 45.2,71.7 r90 bottom
R173 "0R" R0402 35.6,71.3 r270 bottom
R174 "0R" R0402 10.7,39.2 r270 bottom
R175 "200k" R0402 72.8,19.8 r180 top
R176 "200k" R0402 73.7,21.7 r270 top
R177 "200k" R0402 61.3,19.8 r180 top
R178 "200k" R0402 59,19.8 r180 top
R179 "200k" R0402 63.6,19.8 r180 top
R180 "200k" R0402 65.9,19.8 r180 top
R181 "200k" R0402 70.5,19.8 r180 top
R182 "200k" R0402 68.2,19.8 r180 top
R183 "10k" R0402 71.1,24.2 r270 top
R184 "0R" R0402 51.8,30 r270 top
R185 "100k" R0402 18.9,19.1 r180 bottom
R186 "100k" R0402 21.3,19.1 r180 bottom
R187 "10k" R0402 28.5,20.7 r180 bottom
SW1 "FSMRA2JH" FSMRA2JH 20,4 r0 top locked
SW2 "FSMRA3JH" FSMRA3JH 30,4 r0 top locked
SW3 "FSMRA3JH" FSMRA3JH 40,4 r0 top locked
T1 "H5007NL" H5007NL 98.9,82 r90 bottom locked
TP1 "TP_25MILC" TP_25C#1 50.8,38.3 r270 bottom
TP2 "TP_25MILC" TP_25C#1 108.4,93 r90 bottom
TP3 "TP_25MILC" TP_25C#1 94.6,70.5 r90 bottom
TP4 "TP_25MILC" TP_25C#1 118.7,38.1 r90 bottom
TP5 "TP_25MILC" TP_25C#2 108.5,36.6 r90 bottom
TP6 "TP_25MILC" TP_25C#1 41.2,45.2 r90 bottom
TP7 "TP_25MILC" TP_25C#1 43.7,43.2 r90 bottom
TP8 "TP_25MILC" TP_25C#1 37.2,45.2 r90 bottom
TP9 "TP_25MILC" TP_25C#1 39.2,43.2 r90 bottom
TP10 "TP_25MILC" TP_25C#1 88.6,76.3 r90 bottom
U1 "TPS74801DRCR" "DRC (S-PVSON-N10)" 54.2,35.5 r90 top
U2 "TSC2007IPWR" "PW (R-PDGO-G16)" 16.3,23 r0 bottom locked
U3 "TPS74801DRCR" "DRC (S-PVSON-N10)" 95.6,41.25 r270 top locked
U4 "TPA6041A4RHBR" "VQFN32 5X5X0.85" 123.1,28.1 r90 top locked
U5 "MAX9867ETJ+" "QFN32 5X5X0.85" 110.2,40.5 r270 top locked
U6 "PCA9306DCTR" DCT_8 115.6,51.1 r0 top
U7 "CM2020-00TR" TSSOP_38 77.8,93 r90 top locked
U8 "SN74AHC1G09DBVR" DBV_SOT_23_5 118.7,56.2 r0 top
U9 "TPS2034D" 8_SOIC_3.9MM 5.2,14.8 r270 bottom
U10 "LM358AMX" 8_SOIC_3.9MM 112.8,62.1 r180 top
U11 "MIC2026-1YM TR" 8_SOIC_3.9MM 75.4,76.3 r90 top locked
U12 "MIC2026-1YM TR" 8_SOIC_3.9MM 24,67.3 r180 top locked
U13 "USB2514BI-AEZG" QFN36_6MMX6MM 66.2,74.1 r0 top locked
U14 "SGTL5000XNAA3R2" "QFN32 5X5X0.85" 101.7,31.6 r0 top
U15 "TLV803SDBZR" DBZ 62.9,67.9 r90 top
U16 "ISL4245EIRZ" "QFN32 5X5X0.85" 34.7,90.9 r270 bottom locked
U17 "PCF8563T" 8_SOIC_3.9MM 36.1,77.3 r0 bottom locked
U18 "BR24L02FVM-WTR" "MSOP8 _SMALLER" 109.1,52.3 r180 top
U19 "PCA9535BS" HVQFN24_4X4MM 64.7,23.7 r90 top locked
U20 "SN74LVC1G08DCKR" SC70_5 67.4,48.1 r0 top
U21 "SN74LVC1G08DCKR" SC70_5 88.2,48.6 r180 top
U22 "ISL6236AIRZ" 32_VFQFN_EXPOSED_PAD 116.6,79.4 r0 bottom locked
U23 "SN74AHC1G09DBVR" DBV_SOT_23_5 105,57.7 r0 top
U24 "SN74LVC1G08DCKR" SC70_5 32.1,22.8 r90 bottom
Y1 "12.288MHz" ASFLMB 115.9,44.1 r270 bottom
Y2 "24MHz" ABM7_V1_1 65.9,81.6 r180 top
Y3 "32.768kHz" ABS06 30.9,76.1 r90 bottom

## Footprints (in the part's own frame and the unit in brackets; to place one, negate y for a bottom-side part, rotate by r counter-clockwise, add the part's x,y. Pads: shape width x height; smd on the part's side, far side on the other; paste and mask are expansions set on the pad)
4X0402_BLA2A_MURATA [mm]
  rect 0.5x0.25 smd mask+0.025: 1(-0.5,0.75) 2(-0.5,0.25) 3(-0.5,-0.25) 4(-0.5,-0.75) 5(0.5,-0.75) 6(0.5,-0.25) 7(0.5,0.25) 8(0.5,0.75)
  silkscreen extent -0.5,-1.1 0.5,1.1, body extent -0.5,-1 0.5,1, height 0.5
4X_CAP_CC0805_CKCL44 [mm]
  rect 0.6x0.25 smd mask+0.025: 1(-0.575,0.75) 2(-0.575,0.25) 3(-0.575,-0.25) 4(-0.575,-0.75) 5(0.575,-0.75) 6(0.575,-0.25) 7(0.575,0.25) 8(0.575,0.75)
  silkscreen extent -0.6,-1.1 0.65,1.1, body extent -0.7,-1 0.7,1, height 1
8_SOIC_3.9MM [mm]
  rect 1.2x0.58 smd: 1(-2.8,1.905) 2(-2.8,0.635) 3(-2.8,-0.635) 4(-2.8,-1.905) 5(2.8,-1.905) 6(2.8,-0.635) 7(2.8,0.635) 8(2.8,1.905)
  silkscreen extent -1.91,-2.54 1.91,2.54, body extent -3,-2.45 3,2.45, height 1.75
32_VFQFN_EXPOSED_PAD [mm]
  rect 0.6x0.23 smd mask+0.051: 1(-2.4,1.75) 2(-2.4,1.25) 3(-2.4,0.75) 4(-2.4,0.25) 5(-2.4,-0.25) 6(-2.4,-0.75) 7(-2.4,-1.25) 8(-2.4,-1.75) 17(2.4,-1.75) 18(2.4,-1.25) 19(2.4,-0.75) 20(2.4,-0.25) 21(2.4,0.25) 22(2.4,0.75) 23(2.4,1.25) 24(2.4,1.75)
  rect 0.23x0.6 smd mask+0.051: 9(-1.75,-2.4) 10(-1.25,-2.4) 11(-0.75,-2.4) 12(-0.25,-2.4) 13(0.25,-2.4) 14(0.75,-2.4) 15(1.25,-2.4) 16(1.75,-2.4) 25(1.75,2.4) 26(1.25,2.4) 27(0.75,2.4) 28(0.25,2.4) 29(-0.25,2.4) 30(-0.75,2.4) 31(-1.25,2.4) 32(-1.75,2.4)
  rect 3.3x3.3 smd paste-10 mask+0.051: 33(0,0)
  silkscreen extent -2.85,-2.54 2.54,2.93, body extent -2.54,-2.54 2.54,2.54, height 0.9
553-0121F [mm]
  rect 1.9x1.9 hole 1.1: 1(0,0)
  round 1.9 hole 1.1: 2(0,2.54) 3(2.54,0) 4(2.54,2.54)
  silkscreen extent -7.32,-0.89 3.83,3.43, body extent -7.28,-0.9 3.72,3.42, height 9.65
015244449 [mm] "Creator MM"
  rect 3.6x3.6 hole 1.8: 1(0,0)
  round 3.6 hole 1.8: 2(0,-5.08) 3(0,-10.16) 4(0,-15.24)
  silkscreen extent -4.4,-20.42 4.4,5.38, body extent -4.13,-19.25 4.15,4.01, height 10.16
0532610471 [mm] "Creator MM"
  rect 1.6x0.8 smd: 1(-1.45,-1.875) 2(-1.45,-0.625) 3(-1.45,0.625) 4(-1.45,1.875)
  rect 3x2.1 smd: 5(1.45,-4.425) 6(1.45,4.425)
  silkscreen extent -1.4,-3.5 3.7,3.5, body extent -1.6,-5.08 3.6,5.07, height 3.39
ABM7_V1_1 [mm] "Corrected from 2.2 to 2.4 between pads"
  rect 1.9x2.6 smd: 1(-2.15,0) 2(2.15,0)
  silkscreen extent -3.4,-1.8 3.4,1.8, body extent -3.1,-1.85 3.1,1.85, height 1.45
ABS06 [mm]
  rect 0.75x1.4 smd: 1(-0.725,0) 2(0.725,0)
  silkscreen extent -1.4,-1 1.4,1, body extent -1,-0.62 1,0.6, height 0.61
ACM2012 [mm]
  rect 0.75x0.4 smd mask+0.076: 1(-0.925,0.4) 2(-0.925,-0.4) 3(0.925,-0.4) 4(0.925,0.4)
  silkscreen extent -1.1,-0.9 1.1,0.9, body extent -1.2,-0.7 1.2,0.7, height 1.3
ASFLMB [mm] "Creator MM"
  rect 1.2x1.1 smd: 1(-1.27,-1.15) 2(1.27,-1.15) 3(1.27,1.15) 4(-1.27,1.15)
  silkscreen extent -2.57,-2.2 2.63,1.7, body extent -2.47,-1.6 2.53,1.6, height 0.9
BA2032 [mm] "Creator MM. Wrong 3D model."
  round 1.7 hole 1: 1(0,0) 2(26.9,1.27) 3(26.9,-1.27)
  silkscreen extent -0.65,-10.1 27.55,10.1, body extent -0.85,-10 27.75,10, height 5.25
C0402 [mm]
  rect 0.5x0.5 smd: 1(-0.5,0) 2(0.5,0)
  silkscreen extent -1,-0.5 1,0.5, body extent -0.5,-0.25 0.5,0.25, height 0.56
C0603 [mm]
  rect 0.8x0.8 smd: 1(-0.75,0) 2(0.75,0)
  silkscreen extent -1.4,-0.7 1.4,0.7, body extent -0.8,-0.42 0.8,0.44, height 0.95
C0805 [mm]
  rect 0.9x1.3 smd: 1(-0.95,0) 2(0.95,0)
  silkscreen extent -1.78,-1.02 1.78,1.02, body extent -1,-0.6 1,0.6, height 1.5
C1206 [mm]
  rect 0.9x1.6 smd: 1(-1.55,0) 2(1.55,0)
  silkscreen extent -2.29,-1.14 2.29,1.14, body extent -1.6,-0.8 1.6,0.8, height 1.8
"C1206 -  TLN S Case Tantal" [mm] "Creator MM"
  rect 1.15x1.2 smd: 1(-1.175,0) 2(1.175,0)
  silkscreen extent -2.29,-1.14 2.29,1.14, body extent -1.6,-0.8 1.6,0.8, height 1.21
C2917 [mm] "Creator MM. Footprint density lvl B"
  rect 2.37x2.43 smd: 1(-3.12,0) 2(3.12,0)
  silkscreen extent -4.64,-2.65 4.65,2.65, body extent -3.79,-2.3 3.81,2.3, height 3.1
CFAST10 [mm]
  rect 3.6x3 smd: C1(27.35,23.3) C2(27.35,-23.3)
  round 5 hole 2.3 mask+0.025: H1(2.55,20.08) H3(2.55,-20.08)
  round 0 hole 1.75 unplated: H2(5.55,20.08) H4(5.55,-20.08)
  round 0 hole 1.35 unplated: H5(30.65,22.7) H6(30.65,-22.7)
  rect 2.5x0.8 smd: PC1(0,4.595) PC2(0,3.325) PC3(0,2.055) PC4(0,0.785) PC5(0,-0.485) PC6(0,-1.755) PC7(0,-3.025) PC8(0,-4.295) PC9(0,-5.565) PC10(0,-6.835) PC11(0,-8.105) PC12(0,-9.375) PC13(0,-10.645) PC14(0,-11.915) PC15(0,-13.185) PC16(0,-14.455) PC17(0,-15.725) S1(0,15.725) S2(0,14.455) S3(0,13.185) S4(0,11.915) S5(0,10.645) S6(0,9.375) S7(0,8.105)
  silkscreen extent -2,-25.8 42.6,25.8, body extent -1.03,-24.25 38.2,24.25, height 7.69
CFAST_LOCKER [mm]
  body extent -22.41,-19.25 24.82,29.37, height 9.7
DBA9_M_RA [mm]
  rect 1.6x2 hole 1.09: 1(5.556,-1.418)
  oval 1.6x2 hole 1.09: 2(2.783,-1.418) 3(0.011,-1.418) 4(-2.762,-1.418) 5(-5.535,-1.418) 6(4.159,1.418) 7(1.386,1.418) 8(-1.386,1.418) 9(-4.159,1.418)
  round 5 hole 3.18: 10(-12.499,0) 11(12.499,0)
  silkscreen extent -16.8,-3.18 16.8,18.3, body extent -15.4,-2.9 15.4,15.5, height 12.45
DBV_SOT_23_5 [mm]
  rect 1x0.55 smd: 1(-1.35,0.95) 2(-1.35,0) 3(-1.35,-0.95) 4(1.35,-0.95) 5(1.35,0.95)
  silkscreen extent -0.9,-1.59 1.02,1.59, body extent -1.65,-1.69 1.78,1.69, height 1.45
DBZ [mm] "Creator MM"
  rect 1.05x0.6 smd mask+0.07: 1(-1.185,0.95) 2(-1.185,-0.95) 3(1.185,0)
  silkscreen extent -0.8,-1.6 0.8,1.6, body extent -1.26,-1.46 1.26,1.46, height 0.97
DCT_8 [mm] "Creator MM"
  rect 1.6x0.3 smd mask+0.07: 1(-1.7,0.975) 2(-1.7,0.325) 3(-1.7,-0.325) 4(-1.7,-0.975) 5(1.7,-0.975) 6(1.7,-0.325) 7(1.7,0.325) 8(1.7,0.975)
  silkscreen extent -2.2,-1.6 1.5,1.8, body extent -2.1,-1.53 2.1,1.52, height 1.3
"DRC (S-PVSON-N10)" [mm] "Creator MM"
  oval 0.85x0.28 smd mask+0.025: 1(-1.475,1) 2(-1.475,0.5) 3(-1.475,0) 4(-1.475,-0.5) 5(-1.475,-1) 6(1.475,-1) 7(1.475,-0.5) 8(1.475,0) 9(1.475,0.5) 10(1.475,1)
  rect 1.65x2.337 smd paste-1.524 mask+0.025: 11(0,0)
  rect 0.28x0.7 smd mask+0.127: 12(-0.25,1.651) 13(0.25,1.651) 14(0.25,-1.651) 15(-0.25,-1.651)
  silkscreen extent -2.1,-1.65 1.65,1.65, body extent -1.65,-1.65 1.65,1.65, height 1
FI-SE20P-HFE [mm] "Creator MM"
  rect 1.7x0.8 smd: 1(0,0) 2(0,-1.25) 3(0,-2.5) 4(0,-3.75) 5(0,-5) 6(0,-6.25) 7(0,-7.5) 8(0,-8.75) 9(0,-10) 10(0,-11.25) 11(0,-12.5) 12(0,-13.75) 13(0,-15) 14(0,-16.25) 15(0,-17.5) 16(0,-18.75) 17(0,-20) 18(0,-21.25) 19(0,-22.5) 20(0,-23.75)
  rect 2x1.25 smd: 21(3.85,3.5) 22(3.85,-27.25)
  silkscreen extent 0.8,-26.65 5.2,2.9, body extent -0.25,-27.28 5.1,3.47, height 2.11
FID_40X120D [mil]
  round 40 smd paste-40 mask+40: 1(0,0)